# Altium PCB FT8.PcbDoc (part 1 of 2)
Units mm, origin at the board's own origin, x right, y up, seen from the top; angles counter-clockwise.
Board outline 50 x 100 mm, 4 copper layers (Top Layer, Layer 1, Layer 2, Bottom Layer), stack 1.586 mm thick; 161 components, 91 nets, 512 pads, 171 vias.
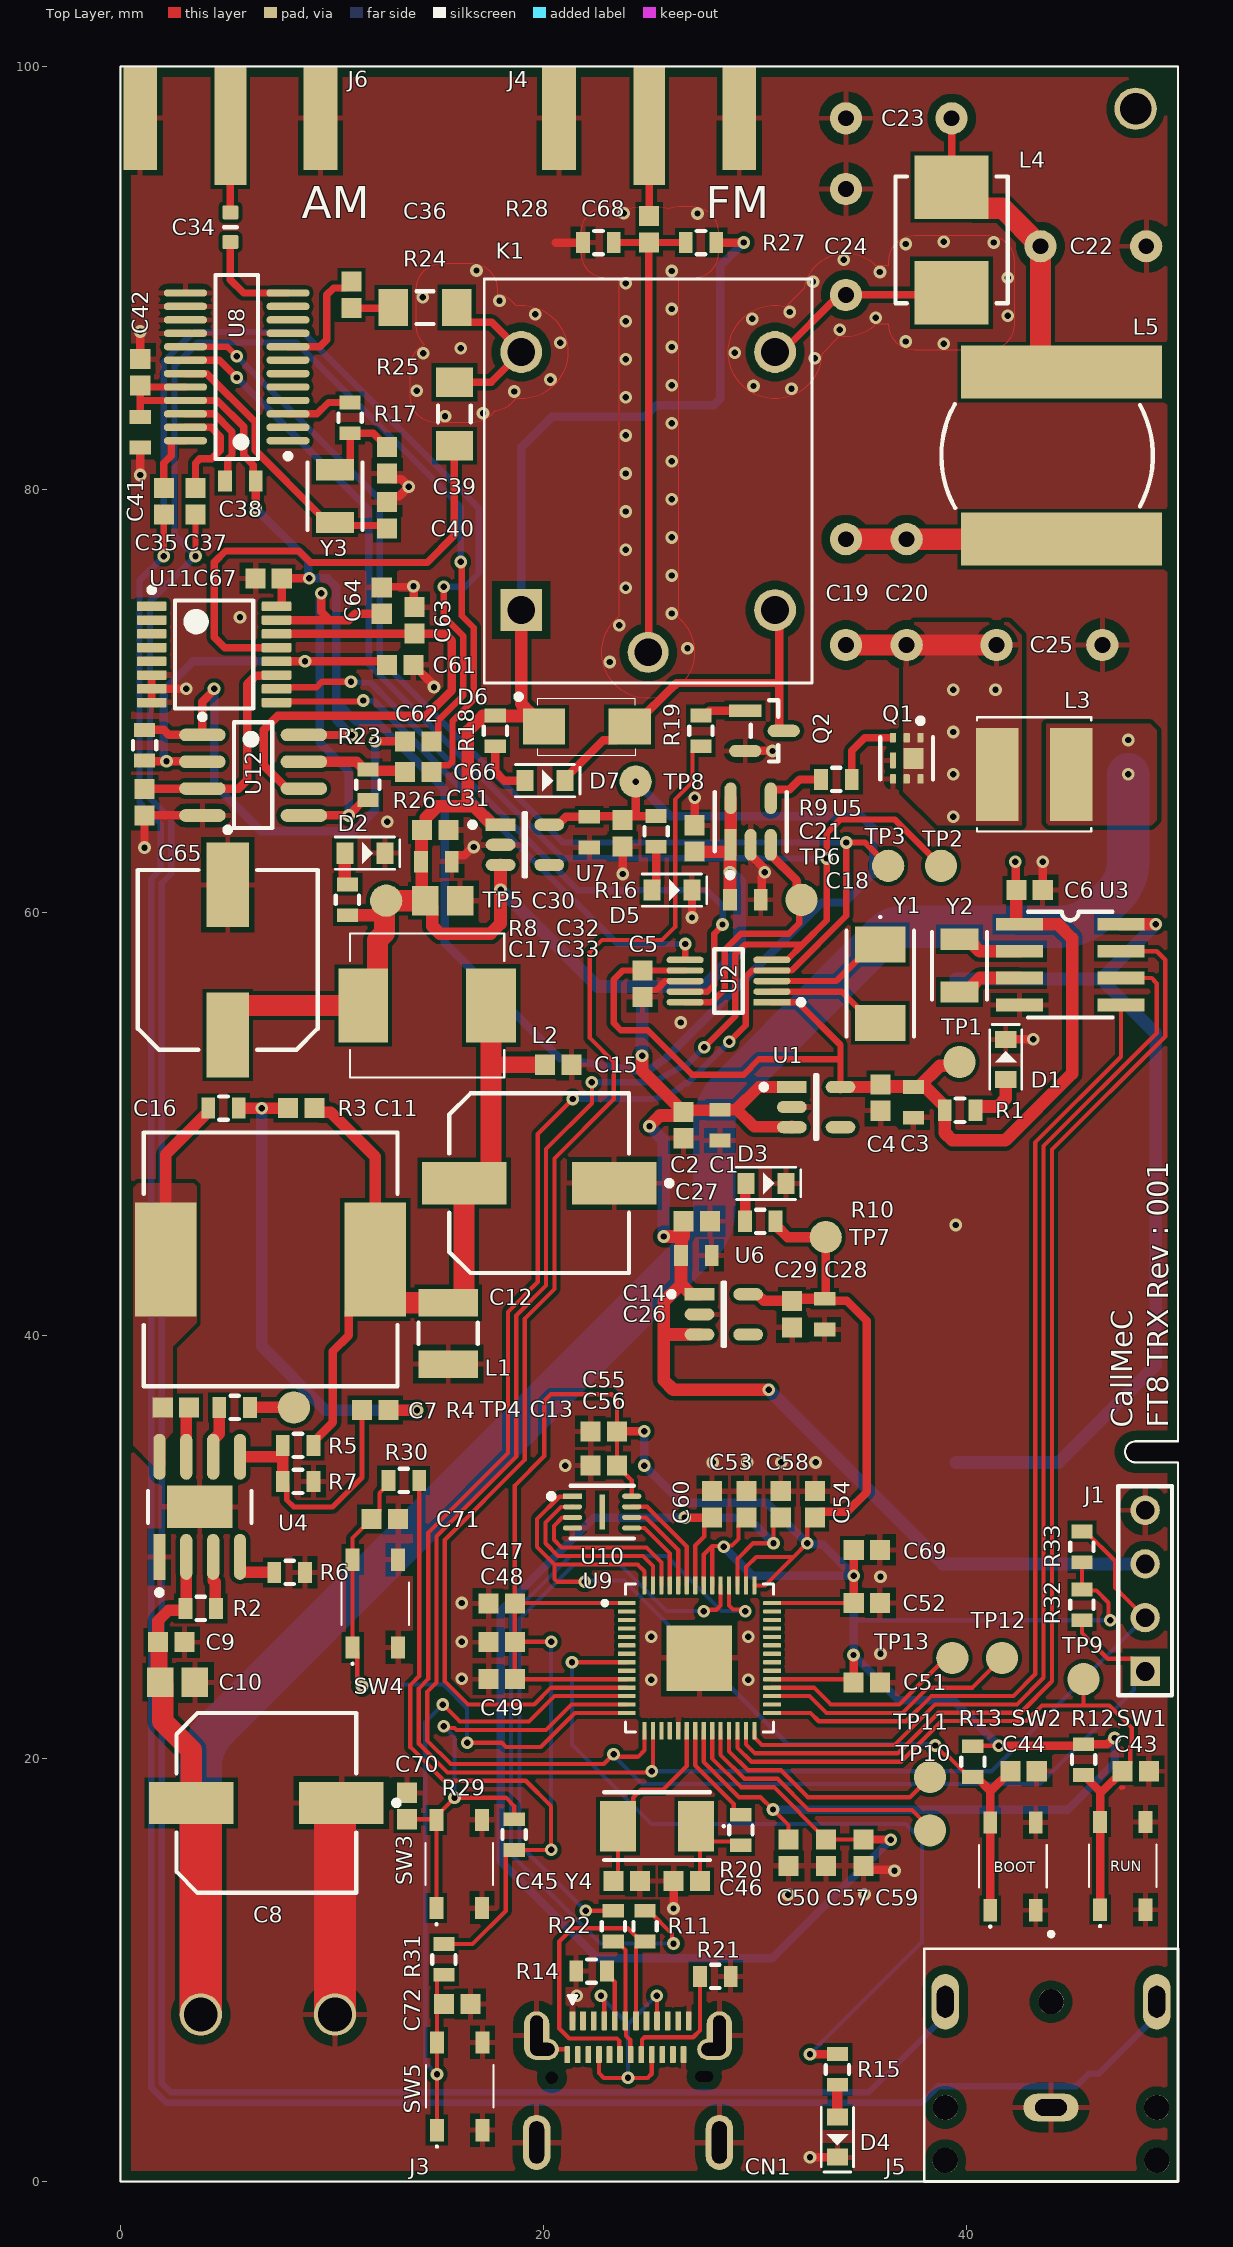
[diagram p0: Top Layer view]
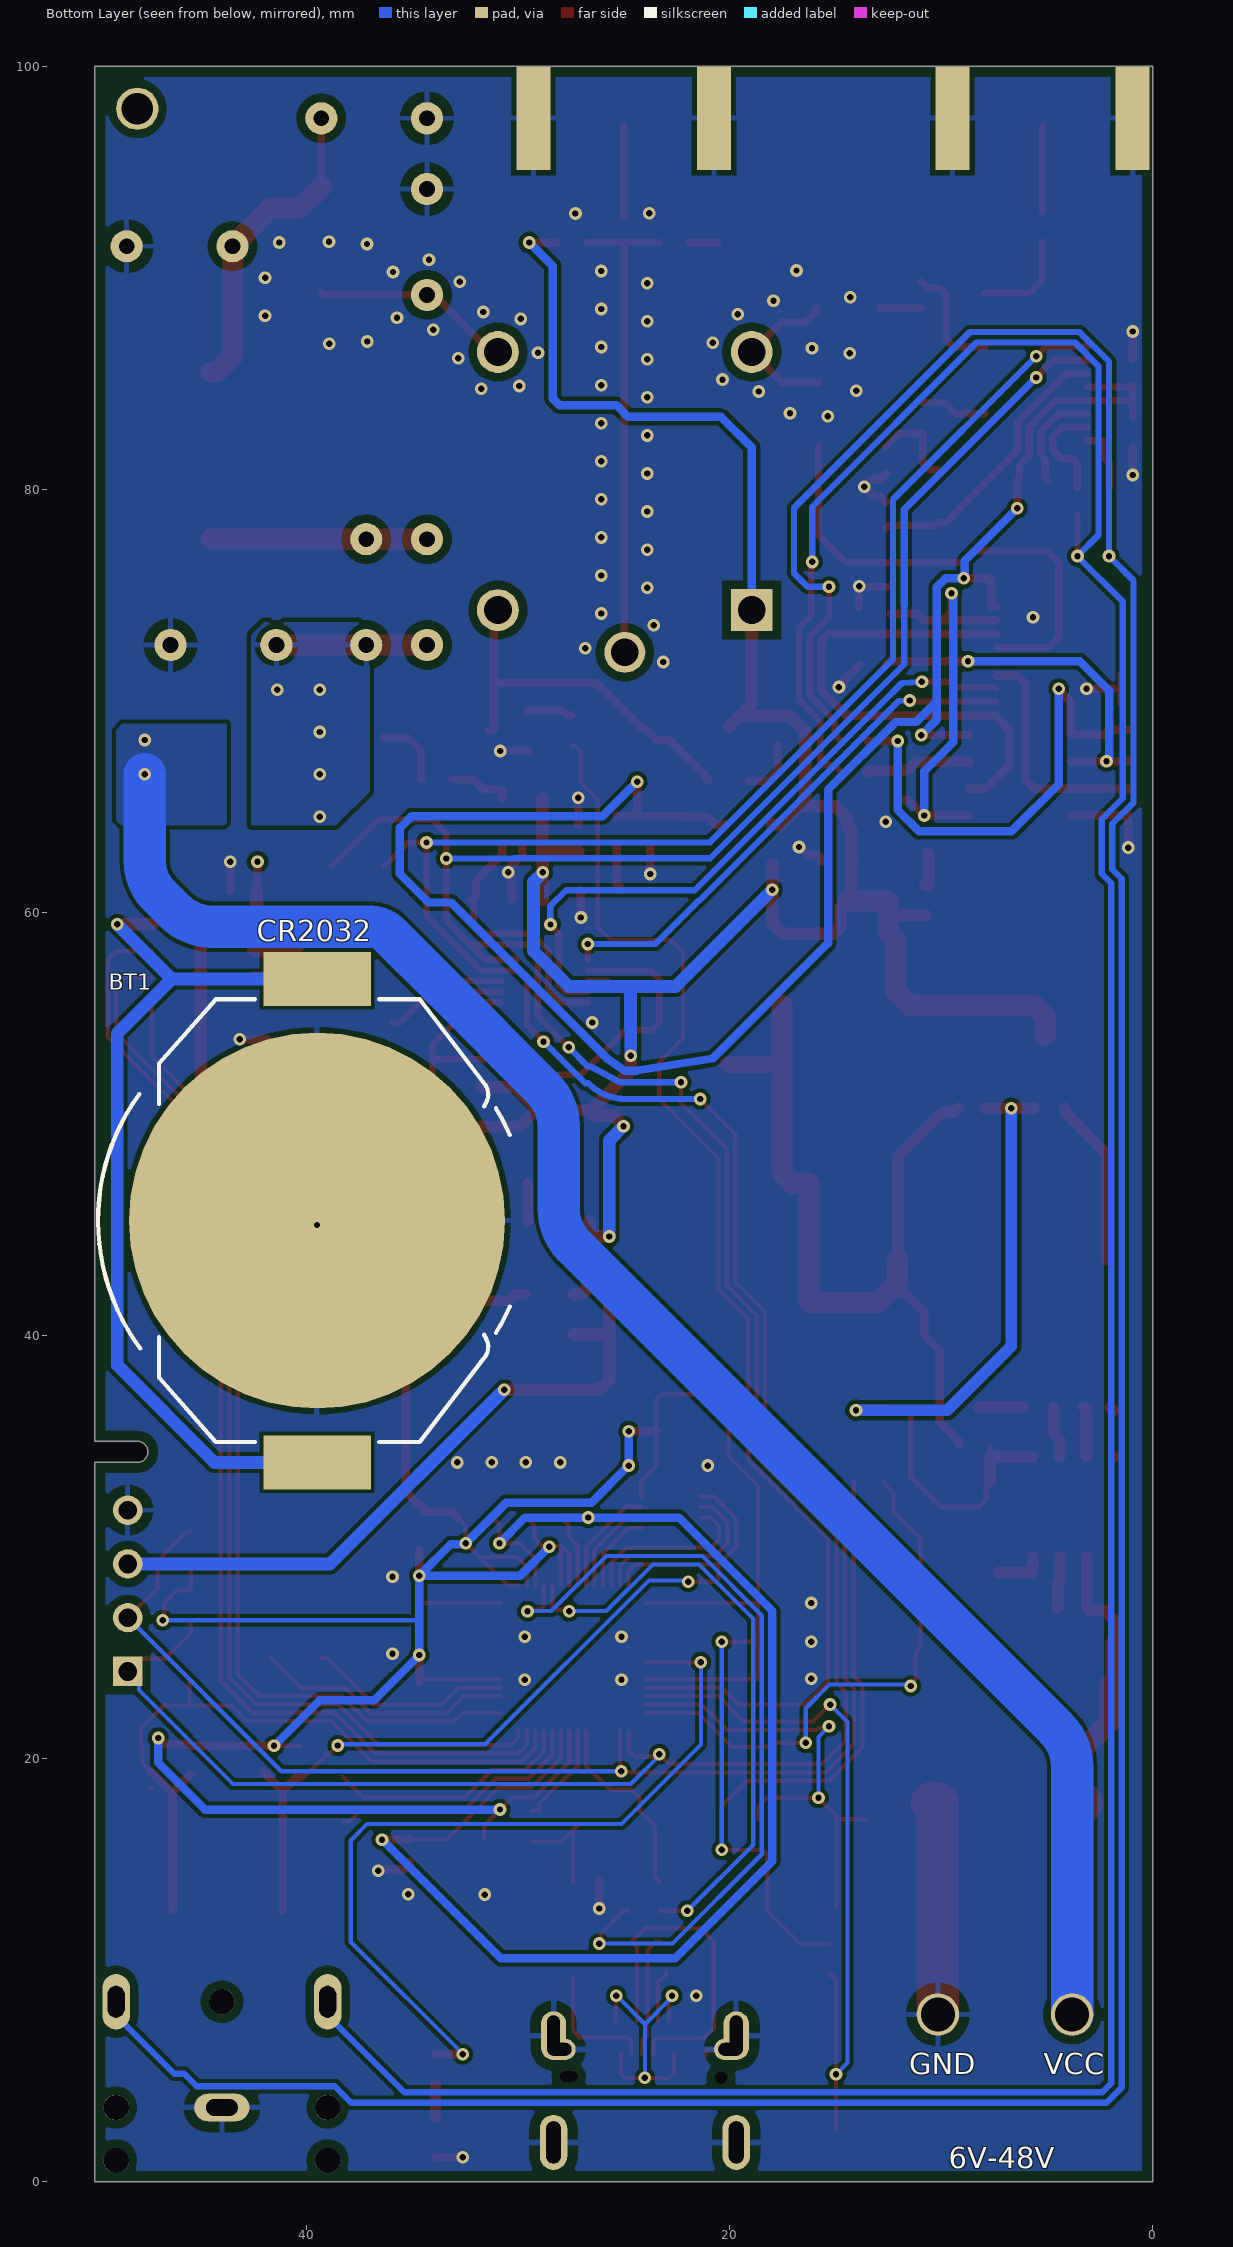
[diagram p1: Bottom Layer view, seen from below]
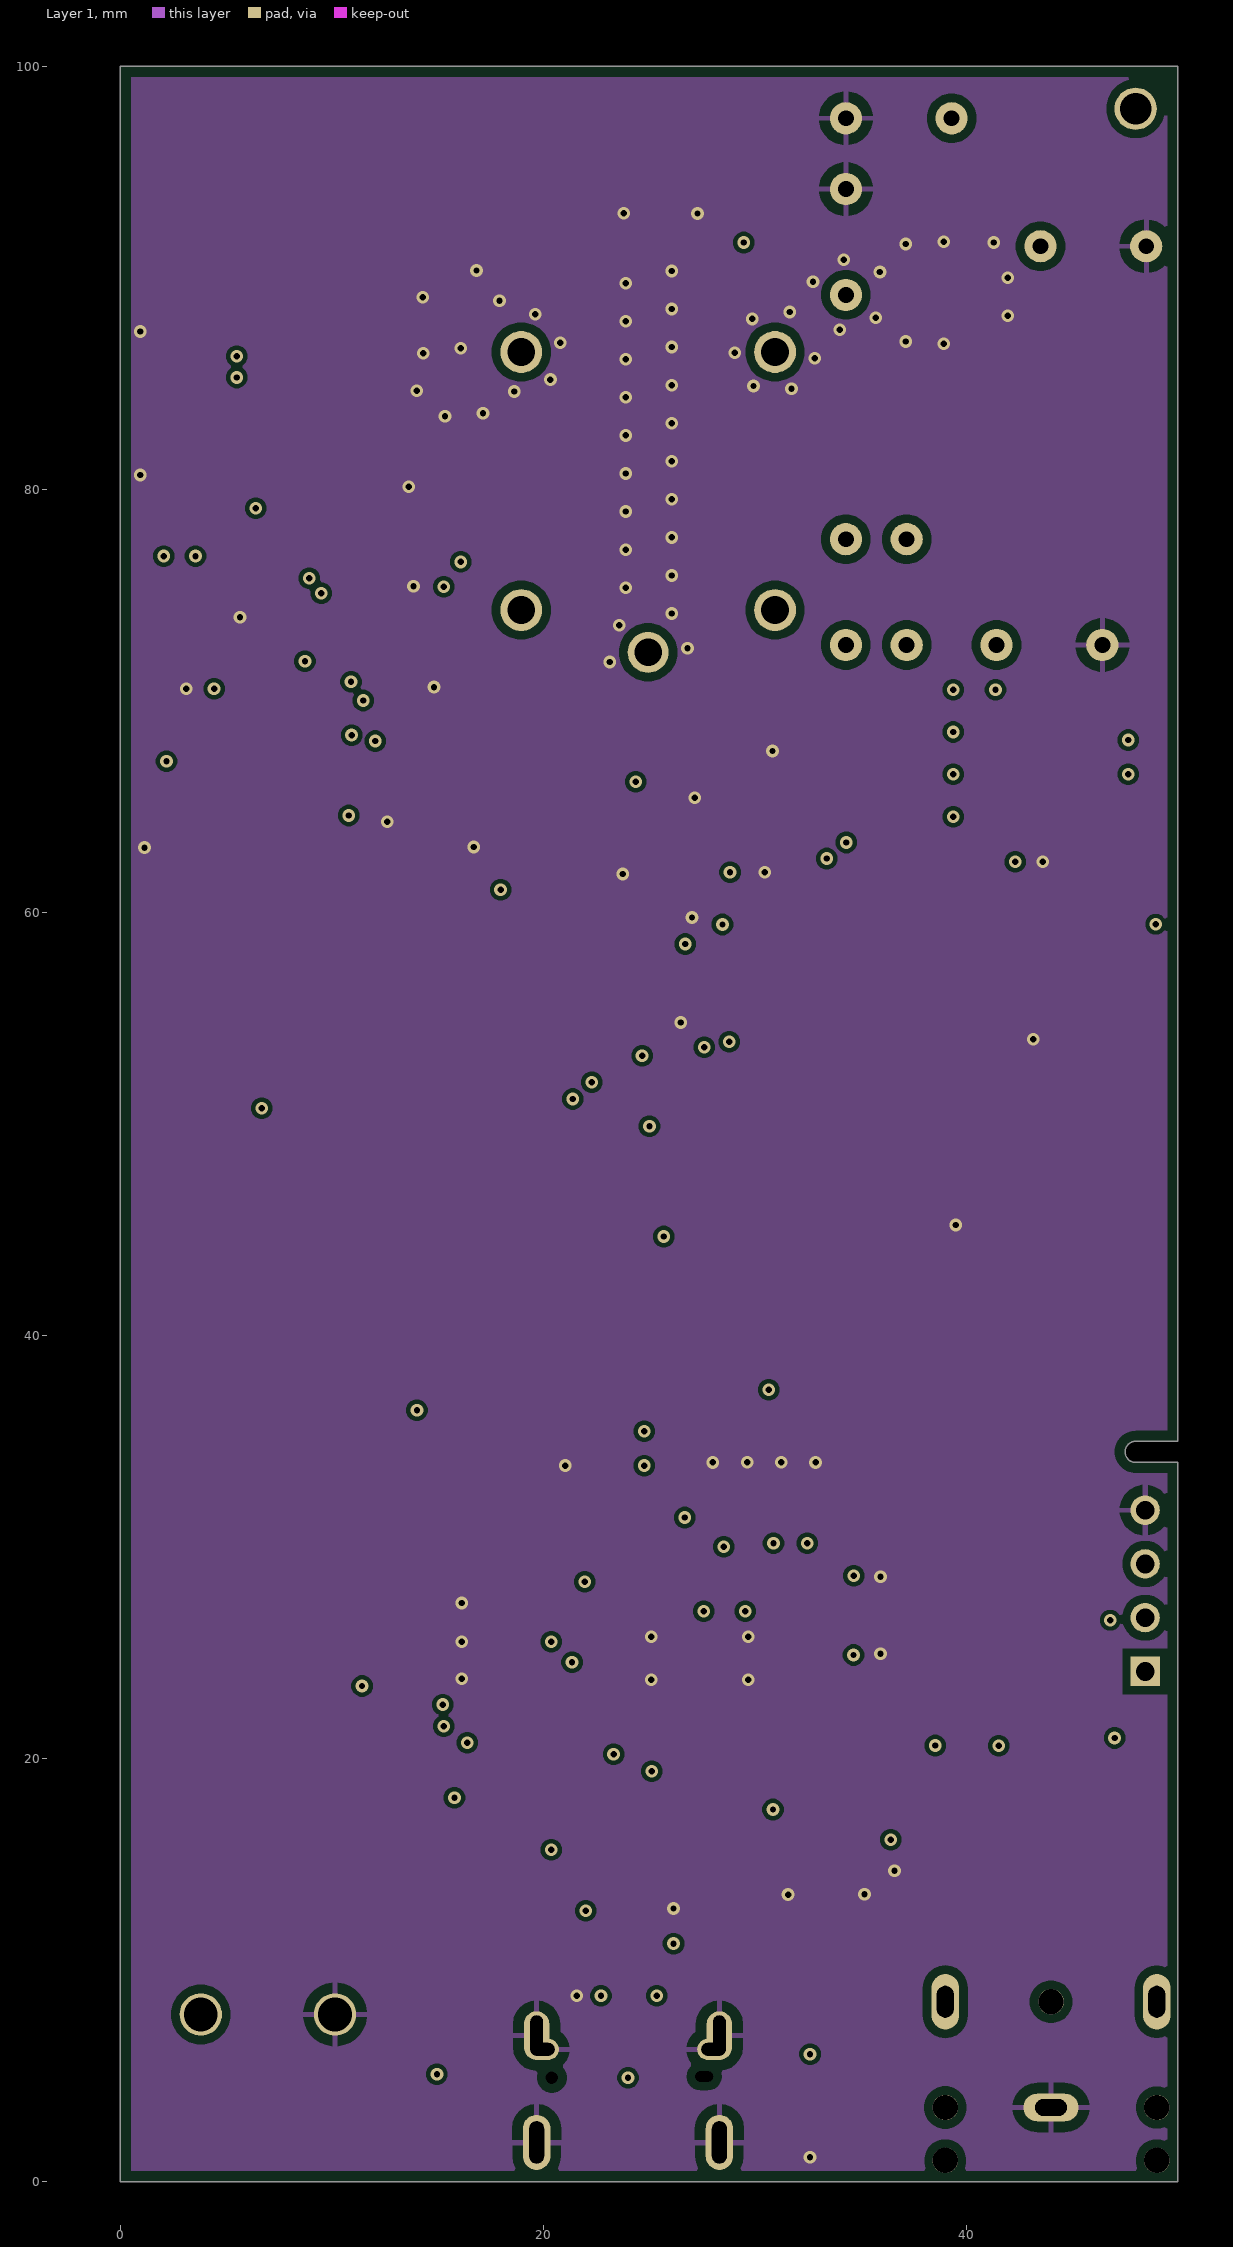
[diagram p2: Layer 1]
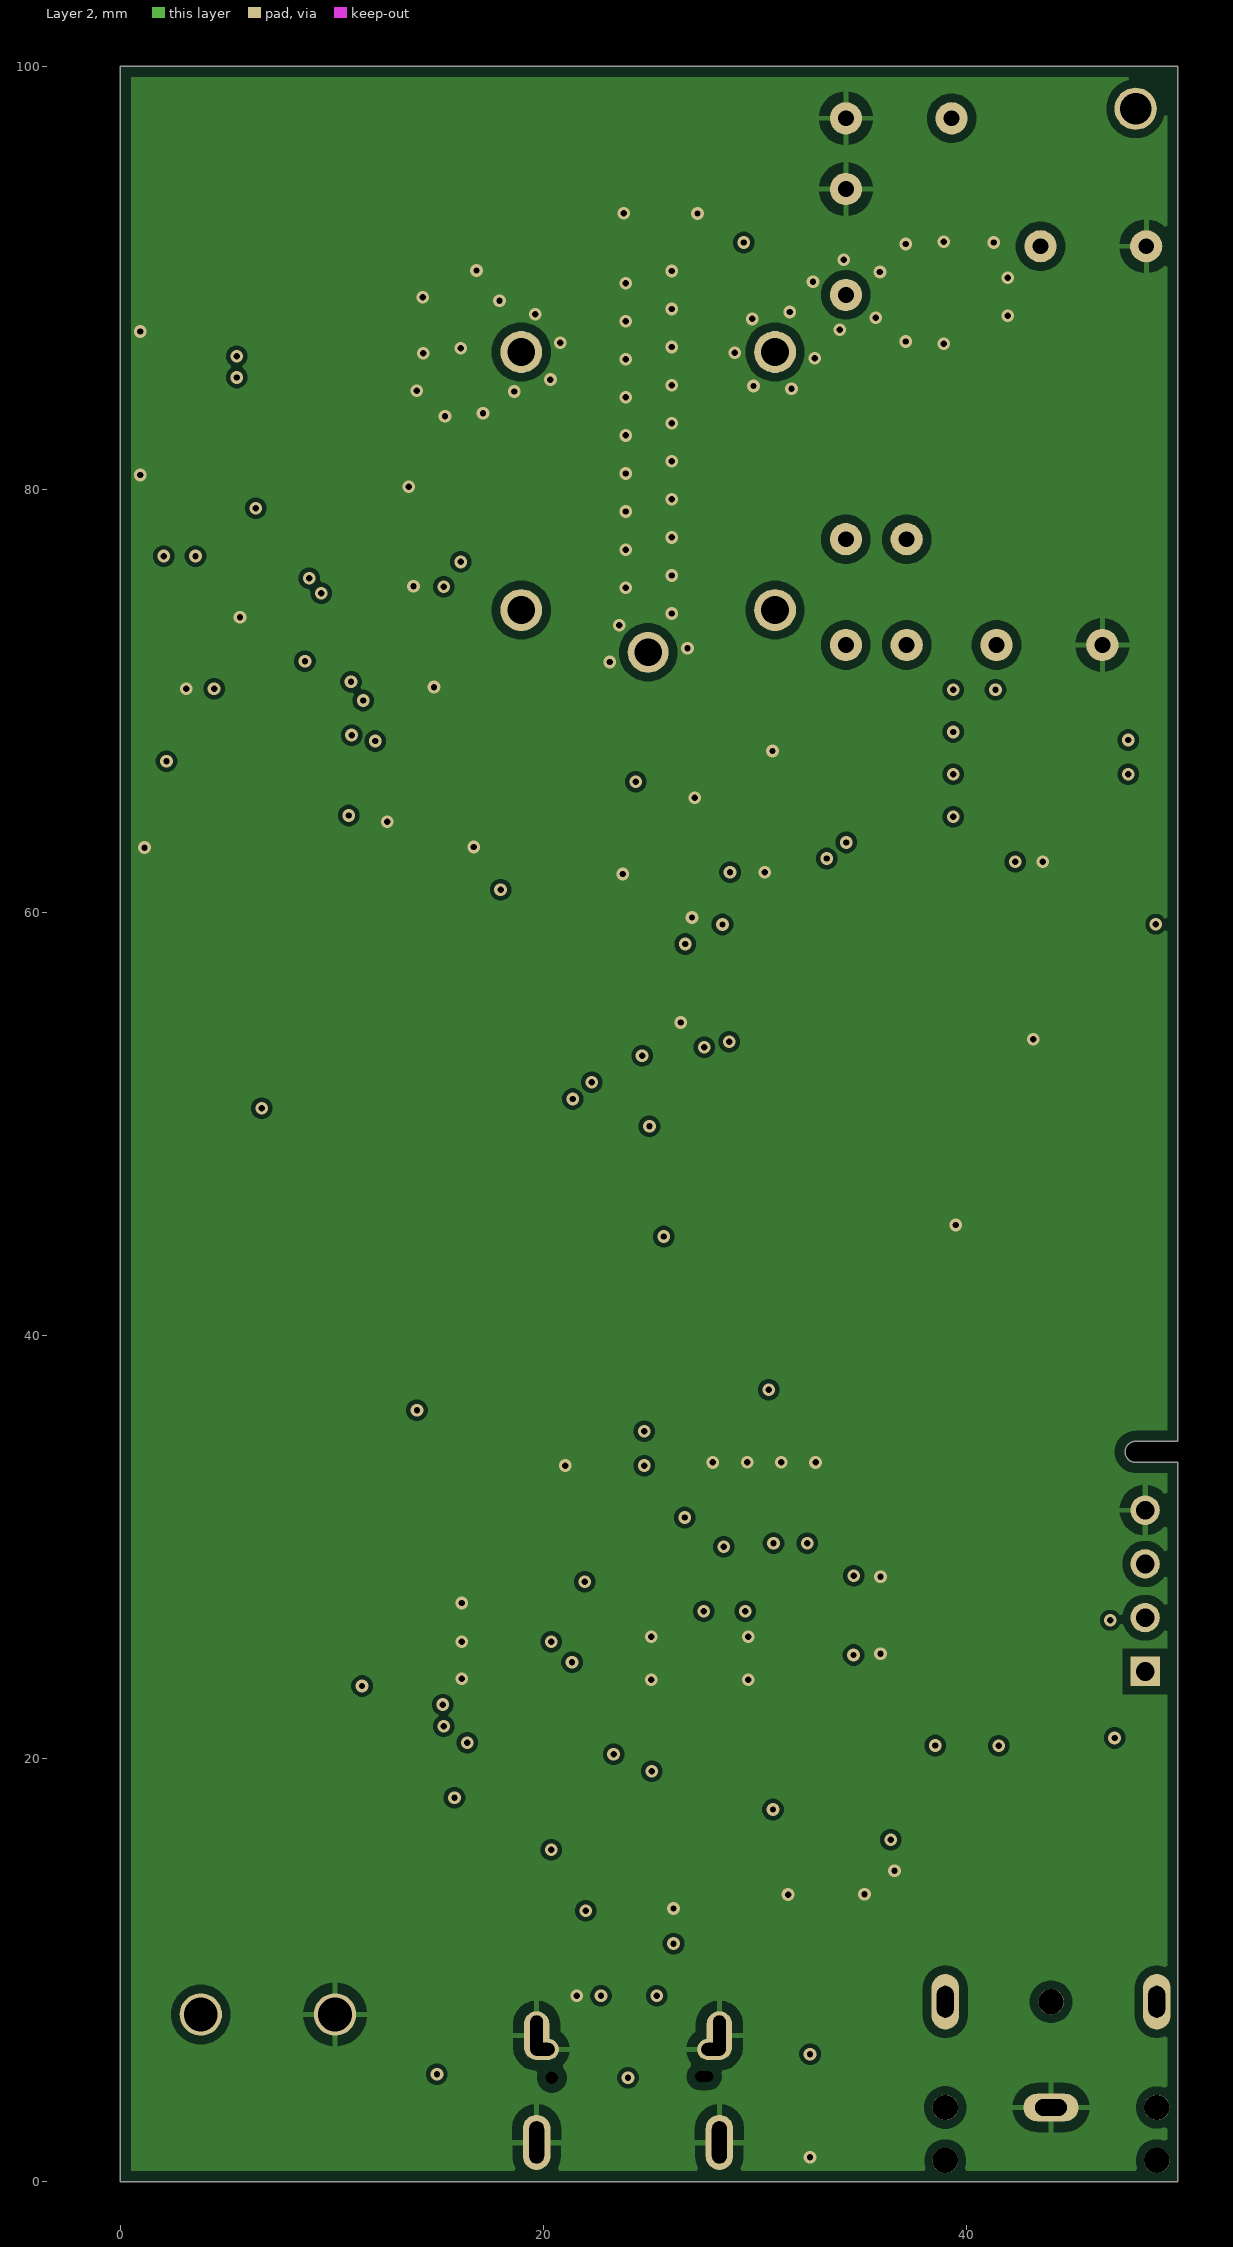
[diagram p3: Layer 2]
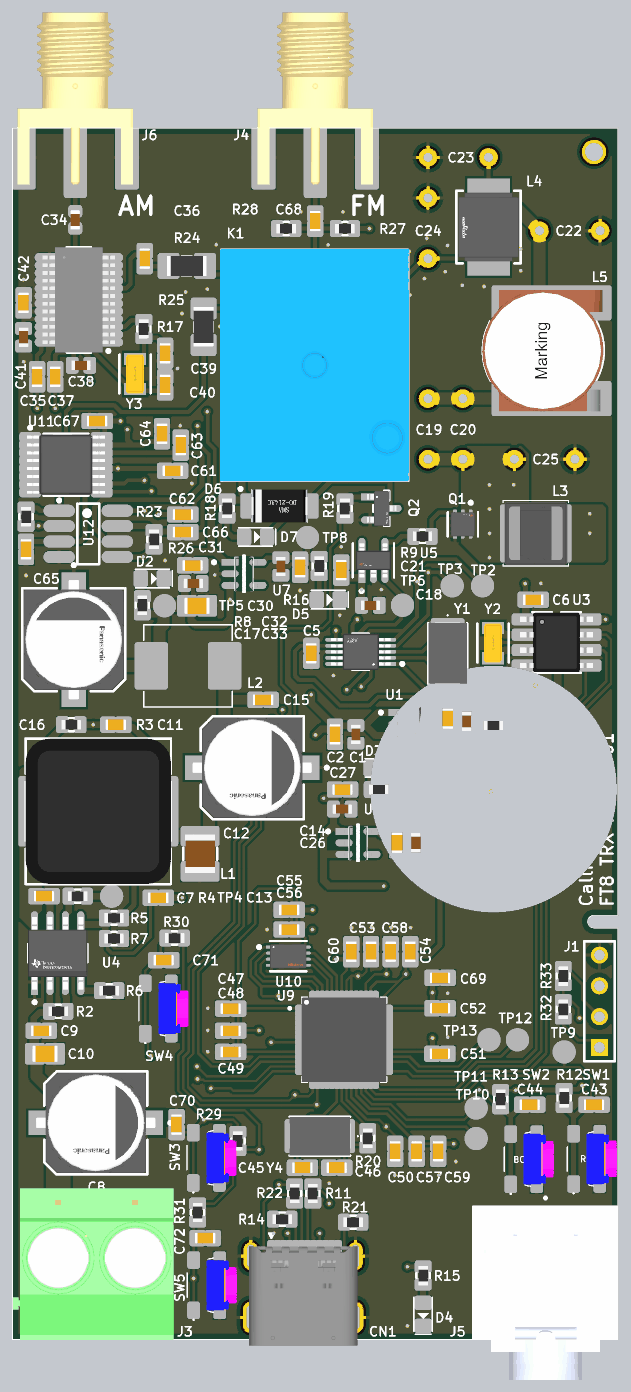
[diagram p5: 3D render of the assembled board from above, using the file's embedded part models]

## Layer stack, top to bottom
Top Solder: solder mask 0.0127, Solder Resist, Dk 3.3
Top Layer: signal copper 0.035
Dielectric 1: prepreg 0.2104, PP-006, Dk 4.4
Layer 1: signal copper 0.0152
Dielectric1: core 1.065, FR-4, Dk 4.6
Layer 2: signal copper 0.0152
Dielectric 2: prepreg 0.2104, PP-006, Dk 4.4
Bottom Layer: signal copper 0.035
Bottom Solder: solder mask 0.0127, Solder Resist, Dk 3.3

## Board outline
0,0 0,100 50,100 50,35 48,35 ccw(c48,34.5) 48,34 50,34 50,0

## Design rules (kind name [scope] priority, off if disabled: settings)
BoardOutlineClearance [All] p1: gap=0.5 ignorepadtopadclearanceinfootprint=FALSE except(0: Arc-SplitContinuation Track-SplitContinuation SMDPad-SplitContinuation THPad-SplitContinuation Via-SplitContinuation Fill-SplitContinuation Poly-SplitContinuation Region-SplitContinuation Text-SplitContinuation; 0.254: Arc-OutlineEdge Arc-CavityEdge Arc-CutoutEdge Arc-SplitBarrior Via-OutlineEdge Via-CavityEdge Via-CutoutEdge Via-SplitBarrior Text-OutlineEdge Text-CavityEdge Text-CutoutEdge Text-SplitBarrior)
Clearance [All] p1: gap=0.2 ignorepadtopadclearanceinfootprint=FALSE except(0.195: Arc-Arc Arc-Track Arc-SMDPad Arc-Fill Arc-Poly Arc-Region Track-Track Track-SMDPad Track-Fill Track-Poly Track-Region SMDPad-SMDPad SMDPad-Fill SMDPad-Poly SMDPad-Region; 0.4: THPad-Fill THPad-Poly THPad-Region)
ComponentClearance [All] p1: gap=0.2 collisioncheckmode=3 verticalgap=0.2 showdistances=FALSE
DiffPairsRouting [All] p1: maxlimit=1 minlimit=0.2 mostfreqgap=0.254 toplayer_minwidth=0.2 toplayer_maxwidth=1 toplayer_prefwidth=0.254 midlayer1_minwidth=0.2 midlayer1_maxwidth=1 midlayer1_prefwidth=0.254 midlayer2_minwidth=0.2 midlayer2_maxwidth=1 midlayer2_prefwidth=0.254 bottomlayer_minwidth=0.2 bottomlayer_maxwidth=1 bottomlayer_prefwidth=0.254 maxuncoupledlength=12.7
HoleSize [All] p1: absolutevalues=TRUE maxlimit=7.62 minlimit=0.2 maxpercent=80.000 minpercent=20.000
HoleToHoleClearance [All] p1: gap=0.2 allowstackedmicrovias=TRUE
MinimumAnnularRing [All] p1: minimumring=0.15
MinimumSolderMaskSliver [All] p1: minsoldermaskwidth=0.05
PasteMaskExpansion [All] p1: expansion=0.2
PlaneClearance [All] p1: clearance=0.381
PlaneConnect [All] p1: pad.planeconnectstyle=Relief pad.reliefexpansion=0.508 pad.reliefentries=4 pad.reliefconductorwidth=0.254 pad.reliefairgap=0.254 via.planeconnectstyle=Direct via.reliefexpansion=0.508 via.reliefentries=4 via.reliefconductorwidth=0.254 via.reliefairgap=0.254
PlaneConnect SMT_DC [IsNamedPolygon('E_AMP_DC')] p2: planeconnectstyle=Direct reliefexpansion=0.508 reliefentries=4 reliefconductorwidth=0.254 reliefairgap=0.254
PolygonConnect POLYGON_SMT_DC [IsNamedPolygon('E_AMP_DC')] p1: thpad.connectstyle=Relief thpad.reliefconductorwidth=0.254 thpad.reliefentries=4 thpad.polygonreliefangle="90 Angle" thpad.airgapwidth=0.254 smdpad.connectstyle=Direct smdpad.reliefconductorwidth=0.254 smdpad.reliefentries=4 smdpad.polygonreliefangle="90 Angle" smdpad.airgapwidth=0.254 via.connectstyle=Direct via.reliefconductorwidth=0.254 via.reliefentries=4 via.polygonreliefangle="90 Angle" via.airgapwidth=0.254
PolygonConnect [All] p2: thpad.connectstyle=Relief thpad.reliefconductorwidth=0.254 thpad.reliefentries=4 thpad.polygonreliefangle="90 Angle" thpad.airgapwidth=0.5 smdpad.connectstyle=Relief smdpad.reliefconductorwidth=0.254 smdpad.reliefentries=4 smdpad.polygonreliefangle="90 Angle" smdpad.airgapwidth=0.254 via.connectstyle=Direct via.reliefconductorwidth=0.254 via.reliefentries=4 via.polygonreliefangle="90 Angle" via.airgapwidth=0.254
RoomDefinition U_02-Clock [InComponentClass('U_02-Clock')] p1: confinementstyle=ConfineIn formatcopy=TRUE lockcomponents=FALSE outline -189.586,-112.446 -138.786,-112.446 -138.786,-87.046 -189.586,-87.046
RoutingVias [All] p1: holewidth=0.3 width=0.6 viastyle="Through Hole" minholewidth=0.3 minwidth=0.5 maxholewidth=0.5 maxwidth=1
SMDNeckDown [All] p1: percent=130.000
SilkToSilkClearance [All] p1: silktosilkclearance=0
SilkToSolderMaskClearance SilkscreenOverComponentPads [IsPad] p1: minsilkscreentomaskgap=0 clearancetoexposedcopper=TRUE
SolderMaskExpansion [All] p1: expansion=0.2 istentingtop=FALSE
UnRoutedNet [All] p1: checkbadconnections=TRUE
Width [All] p1: maxlimit=5 minlimit=0.2 preferedwidth=0.254 midlayer1_minwidth=0.254 midlayer1_maxwidth=0.254 midlayer2_minwidth=0.254 midlayer2_maxwidth=0.254 minimp=50.000000 maximp=50.000000 favimp=50.000000
19 further rules are at their usual default settings.

## Classes and differential pairs
component class U_07-Antena_Manager: C68 D6 D7 K1 Q2 R18 R19 R27 R28
component class U_06-Receiver: C30 C31 C32 C33 C34 C35 C36 C37 C38 C39 C40 C41 C42 C61 C62 C63 C64 C65 C66 C67 D5 J6 R16 R17 R23 R24 R25 R26 TP8 U7 U8 U11 U12 Y3
component class U_05-MCU: C26 C27 C28 C29 C43 C44 C45 C46 C47 C48 C49 C50 C51 C52 C53 C54 C55 C56 C57 C58 C59 C60 C69 C70 C71 C72 CN1 D3 D4 R10 R11 R12 R13 R14 R15 R20 R21 R22 R29 R30 R31 SW1 SW2 SW3 SW4 SW5 TP7 TP9 TP10 TP11 TP12 TP13 U6 U9 U10 Y4
component class U_04-AMP: C18 C19 C20 C21 C22 C23 C24 C25 L3 L4 L5 Q1 R9 TP6 U5
component class U_03-Power_Supplies: C7 C8 C9 C10 C11 C12 C13 C14 C15 C16 C17 D2 L1 L2 R2 R3 R4 R5 R6 R7 R8 TP4 TP5 U4
component class U_02-Clock: BT1 C1 C2 C3 C4 C5 C6 D1 R1 TP1 TP2 TP3 U1 U2 U3 Y1 Y2
component class 01-FBD: J1 J3 J4 J5 R32 R33
differential pair USB_D: +USB_D_P -USB_D_N
differential pair MCU_D: +MCU_D_P -MCU_D_N

## Components (designator, comment, footprint, x,y, rotation, side; value= is the part's Value field where it differs from the comment)
BT1 "BAT-HLD-001" BATHLD-001 39.5,45.43 r90 bottom locked
C1 "10u X5R 35V 10% 0603" C0603 28.351,49.95 r90 top locked value=10u
C2 "100 nF 10% 50 V 0603" CAPC1608X90X40NL10T20 26.628,49.95 r90 top locked value=100nF
C3 "10u X5R 35V 10% 0603" C0603 37.5,51.025 r90 top locked value=10u
C4 "100 nF 10% 50 V 0603" CAPC1608X90X40NL10T20 35.931,51.25 r90 top locked value=100nF
C5 "100 nF 10% 50 V 0603" CAPC1608X90X40NL10T20 24.678,56.634 r270 top locked value=100nF
C6 "100 nF 10% 50 V 0603" CAPC1608X90X40NL10T20 42.984,61.059 r0 top locked value=100nF
C7 "2.2nF 10% X7R 50V" CAPC1608X90X40NL10T20 2.625,36.6 r0 top locked value=2.2nF
C8 "RVT2A100M0810" FP-SF-MFG 6.9,17.9 r180 top locked
C9 "100 nF 10% 100V" CAPC1608X90X40NL10T20 2.4,25.5 r180 top locked value=100nF
C10 "1uF X7R 10% 100 V 0805" CAPC2013X95X50NL10T25 2.7,23.6 r180 top locked value=1uF
C11 "2.2nF 10% X7R 50V" CAPC1608X90X40NL10T20 8.55,50.75 r180 top locked value=2.2nF
C12 "22u X7R 25V 10% 1210" C1210 15.5,40.1 r90 top locked value=22u
C13 "68p 10% 50V" CAPC1608X90X40NL10T20 12.05,36.471 r0 top locked value=68p
C14 "RVT2A100M0810" FP-SF-MFG 19.8,47.2 r180 top locked
C15 "100 nF 10% 100V" CAPC1608X90X40NL10T20 20.7,52.8 r180 top locked value=100nF
C16 "RVT2A100M0810" FP-SF-MFG 5.075,57.759 r270 top locked
C17 "1uF X7R 10% 100 V 0805" CAPC2013X95X50NL10T25 15.242,60.559 r180 top locked value=1uF
C18 "10u X5R 35V 10% 0603" C0603 29.55,60.6 r0 top locked value=10u
C19 "FKP2O111001I00HC00" FKP2O111001I00HC00-Footprint-1 34.3,77.65 r270 top locked value="1n 1000V"
C20 "FKP2D002201D00HA00" FKP2O111001I00HC00-Footprint-1 37.175,72.65 r90 top locked value="220p 100V"
C21 "100 nF 10% 50 V 0603" CAPC1608X90X40NL10T20 27.15,63.5 r90 top locked value=100nF
C22 "FKP2F004701D00HA00" FKP2O111001I00HC00-Footprint-1 48.5,91.5 r180 top locked value="470p 100V"
C23 "FKP2D012201D00HC00" FKP2O111001I00HC00-Footprint-1 34.3,97.55 r0 top locked value="2.2n 100V"
C24 "FKP2O111001I00HC00" FKP2O111001I00HC00-Footprint-1 34.3,89.2 r90 top locked value="1n 1000V"
C25 "FKP2D002201D00HA00" FKP2O111001I00HC00-Footprint-1 46.425,72.65 r180 top value="220p 100V"
C26 "10u X5R 35V 10% 0603" C0603 27.23,43.789 r180 top locked value=10u
C27 "100 nF 10% 50 V 0603" CAPC1608X90X40NL10T20 27.25,45.4 r180 top locked value=100nF
C28 "10u X5R 35V 10% 0603" C0603 33.3,41.011 r90 top locked value=10u
C29 "100 nF 10% 50 V 0603" CAPC1608X90X40NL10T20 31.746,41.011 r90 top locked value=100nF
C30 "10u X5R 35V 10% 0603" C0603 14.942,62.397 r180 top locked value=10u
C31 "100 nF 10% 50 V 0603" CAPC1608X90X40NL10T20 14.884,63.893 r180 top locked value=100nF
C32 "10u X5R 35V 10% 0603" C0603 22.165,63.8 r90 top locked value=10u
C33 "100 nF 10% 50 V 0603" CAPC1608X90X40NL10T20 23.748,63.742 r90 top locked value=100nF
C34 "470nF 20% 25V 0603" CAPC0603(1608)100_L 5.2,92.4 r270 top locked value=470nF
C35 "4.7uF 10% 16 V 0603" CAPC1608X90X40NL10T20 2.054,79.45 r270 top locked value=4.7uF
C36 "1nF 10% 50 V 0603" CAPC1608X90X40NL10T20 10.93,89.2 r90 top locked value=1nF
C37 "4.7uF 10% 16 V 0603" CAPC1608X90X40NL10T20 3.55,79.45 r270 top locked value=4.7uF
C38 "22n X7R 100V 10% 0603" C0603 5.675,80.4 r180 top locked value=22n
C39 "22pF 10% 16V 0603" CAPC1608X90X40NL10T20 12.611,81.382 r90 top locked value=22pF
C40 "22pF 10% 16V 0603" CAPC1608X90X40NL10T20 12.611,78.782 r270 top locked value=22pF
C41 "10u X5R 35V 10% 0603" C0603 0.94,82.707 r90 top locked value=10u
C42 "100 nF 10% 50 V 0603" CAPC1608X90X40NL10T20 0.94,85.55 r270 top locked value=100nF
C43 "10 nF 10% 50 V 0603" CAPC1608X90X40NL10T20 48,19.4 r180 top locked value=10nF
C44 "10 nF 10% 50 V 0603" CAPC1608X90X40NL10T20 42.7,19.4 r180 top locked value=10nF
C45 "20 pF 5% 16V" CAPC1608X90X40NL10T20 23.943,14.201 r180 top locked value=20pF
C46 "20 pF +/- 5% 16 V 0603" CAPC1608X90X40NL10T20 26.778,14.201 r0 top locked value=20pF
C47 "4.7uF 10% 16 V 0603" CAPC1608X90X40NL10T20 18.023,27.327 r0 top locked value=4.7uF
C48 "100 nF 10% 50 V 0603" CAPC1608X90X40NL10T20 18.023,25.5 r0 top locked value=100nF
C49 "100 nF 10% 50 V 0603" CAPC1608X90X40NL10T20 18.023,23.75 r0 top locked value=100nF
C50 "100 nF 10% 50 V 0603" CAPC1608X90X40NL10T20 31.591,15.55 r90 top locked value=100nF
C51 "100 nF 10% 50 V 0603" CAPC1608X90X40NL10T20 35.287,23.6 r180 top locked value=100nF
C52 "100 nF 10% 50 V 0603" CAPC1608X90X40NL10T20 35.296,27.35 r180 top locked value=100nF
C53 "100 nF 10% 50 V 0603" CAPC1608X90X40NL10T20 29.6,32.017 r270 top locked value=100nF
C54 "100 nF 10% 50 V 0603" CAPC1608X90X40NL10T20 32.844,32.017 r270 top locked value=100nF
C55 "4.7uF 10% 16 V 0603" CAPC1608X90X40NL10T20 22.848,35.468 r0 top locked value=4.7uF
C56 "100 nF 10% 50 V 0603" CAPC1608X90X40NL10T20 22.848,33.85 r0 top locked value=100nF
C57 "4.7uF 10% 16 V 0603" CAPC1608X90X40NL10T20 33.366,15.55 r90 top locked value=4.7uF
C58 "100 nF 10% 50 V 0603" CAPC1608X90X40NL10T20 31.222,32.019 r270 top locked value=100nF
C59 "100 nF 10% 50 V 0603" CAPC1608X90X40NL10T20 35.141,15.55 r90 top locked value=100nF
C60 "100 nF 10% 50 V 0603" CAPC1608X90X40NL10T20 27.978,32.017 r270 top locked value=100nF
C61 "2.2nF 10% X7R 50V 0603" CAPC1608X90X40NL10T20 13.234,71.7 r180 top locked value=2.2nF
C62 "4.7uF 10% 16 V 0603" CAPC1608X90X40NL10T20 14.084,68.092 r0 top locked value=4.7uF
C63 "2.2nF 10% X7R 50V 0603" CAPC1608X90X40NL10T20 13.9,73.813 r270 top locked value=2.2nF
C64 "2.2nF 10% X7R 50V 0603" CAPC1608X90X40NL10T20 12.358,74.75 r270 top value=2.2nF
C65 "2.2nF 10% X7R 50V 0603" CAPC1608X90X40NL10T20 1.14,65.213 r90 top locked value=2.2nF
C66 "4.7uF 10% 16 V 0603" CAPC1608X90X40NL10T20 14.084,66.638 r0 top locked value=4.7uF
C67 "100 nF 10% 50 V 0603" CAPC1608X90X40NL10T20 7.004,75.8 r0 top locked value=100nF
C68 "1nF 10% 50 V 0603" CAPC1608X90X40NL10T20 25,92.3 r270 top locked value=1nF
C69 "4.7uF 10% 16 V 0603" CAPC1608X90X40NL10T20 35.296,29.863 r180 top locked value=4.7uF
C70 "10 nF 10% 50 V 0603" CAPC1608X90X40NL10T20 13.559,17.755 r270 top value=10nF
C71 "10 nF 10% 50 V 0603" CAPC1608X90X40NL10T20 12.5,31.325 r180 top value=10nF
C72 "10 nF 10% 50 V 0603" CAPC1608X90X40NL10T20 15.919,8.39 r180 top locked value=10nF
CN1 "DX07S024JJ3R1300" JAE-DX07S024JJ3_V 24,4.9 r0 top locked
D1 "KT-0603G" LED-0603-RED 41.859,53.05 r90 top locked
D2 "KT-0603G" LED-0603-RED 11.56,62.804 r0 top locked
D3 "KT-0603G" LED-0603-RED 30.522,47.189 r0 top locked
D4 "KT-0603G" LED-0603-RED 33.9,2.1 r270 top locked
D5 "KT-0603G" LED-0603-RED 26.075,61.059 r0 top locked
D6 "SS210" DO214AC(SMA) 22.05,68.788 r0 top locked
D7 "KT-0603G" LED-0603-RED 20.075,66.238 r0 top locked
J1 "2.54-1*4P" FP-87224-3-MFG 48.45,26.66 r90 top locked
J3 "MX635-6.35-02P-GN01-Cu-PS-A" MX635-6.35-02P-GN01-Cu-PS-A-Footprint-1 3.8,7.9 r0 top locked
J4 "BWSMA-KE-P001" TE_CONSMA020.062-G 25,100 r180 top locked
J5 "SJ1-3523N" CUI_SJ1-3523N 44,3.5 r0 top locked
J6 "BWSMA-KE-P001" TE_CONSMA020.062-G 5.2,100 r180 top locked
K1 "SRD-05VDC-SL-C" RELAY_SRD-05VDC-SL-C 24.95,80.4 r90 top locked
L1 "SMDRI127-680MT" SUMI-CDRH127_V 7.1,43.6 r90 top locked value="68uH 2.1A"
L2 "FXL0630-100-M" INDP7066X30N 14.5,55.6 r180 top locked value=10u
L3 "SRR5228A-100M" INDP5252X32N 43.2,66.533 r0 top locked value=10uH
L4 "LQH55DNR12M03L" FP-LQH55DN_03-MFG 39.3,91.8 r270 top locked value="120n 2220"
L5 "7449150146" 7449150146 44.5,81.6 r90 top locked value="146n 1212"
Q1 "CSD19538Q2" FP-DQK0006C-MFG 37.175,67.288 r270 top locked
Q2 "2N7002K" FP-318-08-IPC_B 30.45,68.588 r0 top locked
R1 "1K 1% 0.1W" R0603 39.7,50.65 r0 top locked value=1K
R2 "10K 1% 0.1W" R0603 3.8,27.1 r180 top locked value=10K
R3 "681K 1% 0.1W" R0603 4.875,50.75 r180 top locked
R4 "0R 1% 0.1W" R0603 5.4,36.6 r0 top locked value=0R
R5 "681K 1% 0.1W" R0603 8.4,34.8 r0 top locked
R6 "100K 1% 0.1W" R0603 8,28.8 r180 top locked value=100K
R7 "215K 1% 0.1W 0603" R0603 8.4,33.1 r180 top locked
R8 "1K 1% 0.1W" R0603 10.73,60.6 r90 top locked value=1K
R9 "10R 1% 0.1W 0603" R0603 33.85,66.288 r0 top locked value=10R
R10 "1K 1% 0.1W" R0603 30.25,45.4 r180 top locked value=1K
R11 "27R 1% 0.1W 0603" R0603 24.803,12.075 r270 top locked value=27R
R12 "10K 1% 0.1W 0603" R0603 45.537,19.95 r90 top locked value=10K
R13 "10K 1% 0.1W 0603" R0603 40.3,19.85 r90 top locked value=10K
R14 "5.1K 1% 0.1W 0603" R0603 22.276,9.95 r180 top locked value=5.1K
R15 "1K 1% 0.1W" R0603 33.9,5.3 r270 top locked value=1K
R16 "1K 1% 0.1W" R0603 25.327,63.838 r270 top locked value=1K
R17 "2K 1% 0.1W 0603" R0603 10.861,83.389 r270 top locked value=2K
R18 "1K 1% 0.1W" R0603 17.725,68.588 r270 top locked value=1K
R19 "100R 1% 0.1W 0603" R0603 27.45,68.588 r90 top locked value=100R
R20 "1K 1% 0.1W" R0603 29.331,16.621 r90 top locked value=1K
R21 "5.1K 1% 0.1W 0603" R0603 28.128,9.7 r180 top locked value=5.1K
R22 "27R 1% 0.1W 0603" R0603 23.303,12.075 r270 top locked value=27R
R23 "10K 1% 0.1W 0603" R0603 1.14,67.905 r270 top locked value=10K
R24 "0R 1% 1206 250 mW" RESC3116X70X50ML13T20 14.4,88.6 r180 top value=0
R25 "0R 1% 1206 250 mW" RESC3116X70X50ML13T20 15.792,83.574 r270 top locked value=0
R26 "10K 1% 0.1W 0603" R0603 11.7,66.038 r270 top locked value=10K
R27 "2K 1% 0.1W 0603" R0603 27.45,91.675 r0 top locked value=2K
R28 "2K 1% 0.1W 0603" R0603 22.6,91.675 r0 top locked value=2K
R29 "10K 1% 0.1W 0603" R0603 18.617,16.405 r270 top value=10K
R30 "10K 1% 0.1W 0603" R0603 13.4,33.147 r0 top value=10K
R31 "10K 1% 0.1W 0603" R0603 15.294,10.5 r90 top locked value=10K
R32 "10K 1% 0.1W 0603" R0603 45.46,27.265 r90 top locked value=10K
R33 "10K 1% 0.1W 0603" R0603 45.46,30.009 r270 top locked value=10K
SW1 "SKRPASE010" SKRPASE010 47.392,14.926 r90 top locked
SW2 "SKRPASE010" SKRPASE010 42.2,14.9 r90 top locked
SW3 "SKRPASE010" SKRPASE010 16.017,15.013 r90 top
SW4 "SKRPASE010" SKRPASE010 12.05,27.327 r90 top
SW5 "SKRPASE010" SKRPASE010 16.04,4.504 r90 top locked
TP1 "Touchpoint" Touchpoint-Footprint-1 39.675,52.934 r0 top locked
TP2 "Touchpoint" Touchpoint-Footprint-1 38.8,62.208 r90 top
TP3 "Touchpoint" Touchpoint-Footprint-1 36.301,62.208 r90 top
TP4 "Touchpoint" Touchpoint-Footprint-1 8.2,36.6 r90 top
TP5 "Touchpoint" Touchpoint-Footprint-1 12.566,60.559 r90 top
TP6 "Touchpoint" Touchpoint-Footprint-1 32.2,60.6 r90 top locked
TP7 "Touchpoint" Touchpoint-Footprint-1 33.348,44.65 r90 top locked
TP8 "Touchpoint" Touchpoint-Footprint-1 24.361,66.188 r90 top locked
TP9 "Touchpoint" Touchpoint-Footprint-1 45.537,23.75 r90 top locked
TP10 "Touchpoint" Touchpoint-Footprint-1 38.277,16.605 r270 top locked
TP11 "Touchpoint" Touchpoint-Footprint-1 38.277,19.125 r270 top locked
TP12 "Touchpoint" Touchpoint-Footprint-1 41.684,24.75 r90 top locked
TP13 "Touchpoint" Touchpoint-Footprint-1 39.334,24.75 r90 top locked
U1 "AP2127K-3.3TRG1" FP-SOT25-IPC_B 32.897,50.8 r0 top locked
U2 "SI5351A-B-GTR" FP-SI5351A-B-GTR-IPC_B 28.75,56.759 r180 top locked
U3 "DS1302Z" SO8 44.909,57.534 r270 top locked
U4 "LM5164DDAR" FP-DDA0008E-IPC_B 3.75,31.9 r90 top locked
U5 "UCC27519DBVT" FP-DBV0005A-IPC_B 29.8,64.3 r90 top locked
U6 "AP2127K-3.3TRG1" FP-SOT25-IPC_B 28.528,41 r0 top locked
U7 "AP2127K-3.3TRG1" FP-SOT25-IPC_B 19.125,63.2 r0 top locked
U8 "SI4735-D60-GU" SLAB-SSOP-24_N 5.5,85.797 r180 top locked
U9 "RP2040" QFN40P700X700X90-57N 27.378,24.75 r0 top
U10 "W25Q16JVUXIQ" FP-UX-IPC_B 22.776,31.65 r0 top
U11 "SN74LV4052APWR" PW0016A_N 4.429,72.2 r0 top locked
U12 "MCP6002-I/SN" SOIC-SN8_N 6.275,66.492 r0 top locked
Y1 "XG1EL89CKI-111YLC-25M" X50328MSB2GI-Footprint-1 35.925,56.634 r270 top locked value="25MHz 10pF"
Y2 "Q13FC13500049" FP-ABS07-120-MFG 39.675,57.484 r90 top locked value="32.768kHz 6pF"
Y3 "Q13FC13500049" FP-ABS07-120-MFG 10.14,79.682 r90 top locked value="32.768kHz 6pF"
Y4 "X503212MSB2GI" X50328MSB2GI-Footprint-1 25.373,16.801 r180 top locked

## Footprints (in the part's own frame and the unit in brackets; to place one, negate y for a bottom-side part, rotate by r counter-clockwise, add the part's x,y. Pads: shape width x height; smd on the part's side, far side on the other; paste and mask are expansions set on the pad)
7449150146 [mm] "Air Coil High Current Inductor, size 1010"
  rect 2.5x9.5 smd: 1(-3.95,0) 2(3.95,0)
  silkscreen extent -2.47,-4.31 2.43,5.68, body extent -5,-4.28 5,5.73, height 6.26
BATHLD-001 [mm] "LINX CR2032 BATTERY HOLDER"
  round 17.78 smd: 1(0,0)
  rect 2.54x5.08 smd: 2(-11.43,0) 2(11.43,0)
  silkscreen extent -10.47,-9.11 10.47,10.35, body extent -10.32,-9.95 10.32,10.38, height 4.3
C0603 [mm]
  rect 0.65x1 smd: 1(-0.725,0) 2(0.725,0)
  body extent -0.8,-0.4 0.8,0.4, height 0.8
C1210 [mm]
  rect 1.3x2.8 smd: 1(-1.45,0) 2(1.45,0)
  silkscreen extent -0.5,-1.4 0.5,1.4, body extent -1.6,-1.25 1.6,1.25, height 2.5
CAPC0603(1608)100_L [mm] "Chip Capacitor, Body 1.6x0.8mm, Height 1.0mm, IPC High Density"
  rrect25% 0.66x0.76 smd: 1(-0.7,0) 2(0.7,0)
  silkscreen extent 0,-0.3 0,0.3, body extent -0.8,-0.4 0.8,0.4, height 0.95
CAPC1608X90X40NL10T20 [mm] "Chip Capacitor, 2-Leads, Body 1.70x0.90mm, IPC Medium Density"
  rect 0.95x0.95 smd: 1(-0.625,0) 2(0.625,0)
  body extent -0.85,-0.45 0.85,0.45, height 0.9
CAPC2013X95X50NL10T25 [mm] "Chip Capacitor, 2-Leads, Body 2.10x1.35mm, IPC Medium Density"
  rect 1.25x1.4 smd: 1(-0.825,0) 2(0.825,0)
  body extent -1.05,-0.67 1.05,0.67, height 0.95
CUI_SJ1-3523N [mm]
  oval 2.616x1.308 hole 0.8 slot 1.5 at 0 deg: 1(0,0)
  oval 1.308x2.616 hole 0.8 slot 1.5 at 90 deg: 2(5,5) 3(-5,5)
  round 1.2 hole 1.2 unplated: ""(-5,-2.5) ""(-5,0) ""(0,5) ""(5,-2.5) ""(5,0)
  silkscreen extent -6,-3.5 6,8.3, body extent -6,-6.81 6,7.49, height 5.8
DO214AC(SMA) [mm] "Magnetic-Core Inductor with Winding Polarity Marking; 2 Leads"
  rect 2x1.7 smd: 1(2.025,0) 2(-2.025,0)
  silkscreen extent -2.31,-1.35 2.31,1.35, body extent -2.3,-1.35 2.3,1.35, height 2.4
FKP2O111001I00HC00-Footprint-1 [mil]
  round 60 hole 29.53: 1(0,0) 2(196.85,0)
FP-318-08-IPC_B [mm]
  rect 1.524x0.578 smd paste+0 mask+0: 1(-0.91,0.95)
  rrect100% 1.524x0.578 smd paste+0 mask+0: 2(-0.91,-0.95) 3(0.91,0)
  silkscreen extent -0.65,-1.45 0.65,1.45, body extent -1.92,-1.7 1.92,1.7, height 0.25
FP-87224-3-MFG [mil]
  rect 54.69x54.69 hole 35 paste-99999 mask+0: 1(-100,0)
  round 54.69 hole 35 paste-99999 mask+0: 2(0,0) 3(100,0) 4(200,0)
  silkscreen extent -145,-50 245,50
FP-ABS07-120-MFG [mm]
  rect 1x1.8 smd paste+0 mask+0: 1(-1.25,0) 2(1.25,0)
  silkscreen extent -1.6,-1.3 1.6,1.3, body extent -1.85,-1 1.85,1, height 0.25
FP-DBV0005A-IPC_B [mm]
  rect 1.505x0.572 smd paste+0 mask+0: 1(-1.1,0.95)
  rrect100% 1.505x0.572 smd paste+0 mask+0: 2(-1.1,0) 3(-1.1,-0.95) 4(1.1,-0.95) 5(1.1,0.95)
  silkscreen extent -2.65,-1.7 1.4,1.7, body extent -2.1,-1.7 2.1,1.7, height 0.25
FP-DDA0008E-IPC_B [mm]
  rect 2.174x0.582 smd paste+0 mask+0: 1(-2.366,1.905)
  rrect100% 2.174x0.582 smd paste+0 mask+0: 2(-2.366,0.635) 3(-2.366,-0.635) 4(-2.366,-1.905) 5(2.366,-1.905) 6(2.366,-0.635) 7(2.366,0.635) 8(2.366,1.905)
  rect 2.025x3.1 smd paste-1000 mask+0: 9(0,0)
  silkscreen extent -4.17,-2.45 0.75,2.45, body extent -3.7,-2.7 3.7,2.7, height 0.25
FP-DQK0006C-MFG [mm]
  rrect33% 0.45x0.3 smd paste+0 mask+0: 1(-0.975,0.65) 2(-0.975,0) 3(-0.975,-0.65) 4(0.975,-0.65) 5(0.975,0) 6(0.975,0.65)
  rrect33% 0.75x0.3 smd paste-1000 mask+0: 7(0.095,-0.65)
  rrect11% 1x0.95 smd paste-1000 mask+0: 8(0,0.325)
  silkscreen extent -1.9,-1.25 1,1.25, body extent -1.3,-1.15 1.3,1.15, height 0.25
FP-LQH55DN_03-MFG [mm]
  rect 3x3.5 smd paste+0 mask+0: 1(-2.5,0) 2(2.5,0)
  silkscreen extent -3,-2.65 3,2.65, body extent -4.1,-2.75 4.1,2.75, height 0.25
FP-SF-MFG [mm]
  rect 4x2 smd paste+0 mask+0: 1(-3.55,0) 2(3.55,0)
  silkscreen extent -6.28,-4.25 4.25,4.25, body extent -5.8,-4.5 5.8,4.5, height 0.25
FP-SI5351A-B-GTR-IPC_B [mm]
  rect 1.754x0.305 smd paste+0 mask+0: 1(-2.05,1)
  rrect100% 1.754x0.305 smd paste+0 mask+0: 2(-2.05,0.5) 3(-2.05,0) 4(-2.05,-0.5) 5(-2.05,-1) 6(2.05,-1) 7(2.05,-0.5) 8(2.05,0) 9(2.05,0.5) 10(2.05,1)
  silkscreen extent -3.55,-1.5 0.67,1.5, body extent -3.18,-1.75 3.18,1.75, height 0.25
FP-SOT25-IPC_B [mm]
  rect 1.407x0.576 smd paste+0 mask+0: 1(-1.151,0.95)
  rrect100% 1.407x0.576 smd paste+0 mask+0: 2(-1.151,0) 3(-1.151,-0.95) 4(1.151,-0.95) 5(1.151,0.95)
  silkscreen extent -2.6,-1.5 0.05,1.5, body extent -2.1,-1.75 2.1,1.75, height 0.25
FP-UX-IPC_B [mm]
  rect 0.911x0.242 smd paste+0 mask+0: 1(-1.401,0.75)
  rrect100% 0.911x0.242 smd paste+0 mask+0: 2(-1.401,0.25) 3(-1.401,-0.25) 4(-1.401,-0.75) 5(1.401,-0.75) 6(1.401,-0.25) 7(1.401,0.25) 8(1.401,0.75)
  rect 0.25x1.65 smd paste-1000 mask+0: 9(0,0)
  silkscreen extent -2.53,-1.25 1.5,1.25, body extent -2.11,-1.25 2.11,1.25, height 0.25
INDP5252X32N [mm] "Precision Wire Wound Inductor, 2-Leads, Body 5,20x5,20mm, IPC Medium Density"
  rect 2x4.4 smd: 1(-1.75,0) 2(1.75,0)
  silkscreen extent -2.7,-2.7 2.7,2.7, body extent -2.6,-2.6 2.6,2.6, height 3.2
INDP7066X30N [mm] "Precision Wire Wound Inductor, 2-Leads, Body 7,00x6,60mm, IPC Medium Density"
  rect 2.35x3.5 smd: 1(-3.025,0) 2(3.025,0)
  silkscreen extent -3.65,-3.4 3.65,3.4, body extent -3.65,-3.4 3.65,3.4, height 3
JAE-DX07S024JJ3_V [mm] "THD, 24-Leads, Body 8.17x8.94mm, Pitch 0.5mm"
  oval 1.2x2.3 hole 0.6 slot 1.9 at 90 deg: 1(-4.32,2) 2(4.32,2)
  oval 1.5x1 hole 0.6 slot 1.1 at 0 deg: 1(-4.02,1.35) 2(4.02,1.35)
  oval 1.3x2.6 hole 0.7 slot 2 at 90 deg: 3(-4.32,-3.05) 4(4.32,-3.05)
  rrect25% 0.27x0.9 smd: A1(-2.625,2.7) A2(-2.125,2.7) A3(-1.625,2.7) A4(-1.125,2.7) A5(-0.625,2.7) A6(-0.125,2.7) A7(0.375,2.7) A8(0.875,2.7) A9(1.375,2.7) A10(1.875,2.7) A11(2.375,2.7) A12(2.875,2.7)
  rrect25% 0.27x0.8 smd: B1(2.625,1.1) B2(2.125,1.1) B3(1.625,1.1) B4(1.125,1.1) B5(0.625,1.1) B6(0.125,1.1) B7(-0.375,1.1) B8(-0.875,1.1) B9(-1.375,1.1) B10(-1.875,1.1) B11(-2.375,1.1) B12(-2.875,1.1)
  round 0 hole 0.6 unplated: H1(-3.6,0)
  round 0 hole 0.5 slot 0.85 at 0 deg unplated: H2(3.6,0.065)
  silkscreen extent -2.83,3.49 -2.43,3.89, body extent -4.47,-5.35 4.47,2.8, height 3.16
LED-0603-RED [mm]
  rect 0.8x1 smd: 1(-0.95,0) 2(0.95,0)
  silkscreen extent -1.4,-0.76 1.65,0.76, body extent -0.8,-0.4 0.8,0.4, height 0.6
MX635-6.35-02P-GN01-Cu-PS-A-Footprint-1 [mm]
  round 2 hole 1.6: 1(0,0) 2(6.35,0)
  body extent -3.77,-7.9 9.53,4.6, height 20.75
PW0016A_N [mm] "SOP, 16-Leads, Body 5.1x4.5mm, Pitch 0.65mm, IPC Medium Density"
  rrect22% 1.4x0.45 smd: 1(-2.95,2.275) 2(-2.95,1.625) 3(-2.95,0.975) 4(-2.95,0.325) 5(-2.95,-0.325) 6(-2.95,-0.975) 7(-2.95,-1.625) 8(-2.95,-2.275) 9(2.95,-2.275) 10(2.95,-1.625) 11(2.95,-0.975) 12(2.95,-0.325) 13(2.95,0.325) 14(2.95,0.975) 15(2.95,1.625) 16(2.95,2.275)
  silkscreen extent -3.07,-2.55 1.85,3.17, body extent -3.21,-2.5 3.21,2.5, height 1
QFN40P700X700X90-57N [mm]
  rrect25% 0.84x0.2 smd: 1(-3.435,2.6) 2(-3.435,2.2) 3(-3.435,1.8) 4(-3.435,1.4) 5(-3.435,1) 6(-3.435,0.6) 7(-3.435,0.2) 8(-3.435,-0.2) 9(-3.435,-0.6) 10(-3.435,-1) 11(-3.435,-1.4) 12(-3.435,-1.8) 13(-3.435,-2.2) 14(-3.435,-2.6) 29(3.435,-2.6) 30(3.435,-2.2) 31(3.435,-1.8) 32(3.435,-1.4) 33(3.435,-1) 34(3.435,-0.6) 35(3.435,-0.2) 36(3.435,0.2) 37(3.435,0.6) 38(3.435,1) 39(3.435,1.4) 40(3.435,1.8) 41(3.435,2.2) 42(3.435,2.6)
  rrect25% 0.2x0.84 smd: 15(-2.6,-3.435) 16(-2.2,-3.435) 17(-1.8,-3.435) 18(-1.4,-3.435) 19(-1,-3.435) 20(-0.6,-3.435) 21(-0.2,-3.435) 22(0.2,-3.435) 23(0.6,-3.435) 24(1,-3.435) 25(1.4,-3.435) 26(1.8,-3.435) 27(2.2,-3.435) 28(2.6,-3.435) 43(2.6,3.435) 44(2.2,3.435) 45(1.8,3.435) 46(1.4,3.435) 47(1,3.435) 48(0.6,3.435) 49(0.2,3.435) 50(-0.2,3.435) 51(-0.6,3.435) 52(-1,3.435) 53(-1.4,3.435) 54(-1.8,3.435) 55(-2.2,3.435) 56(-2.6,3.435)
  rect 3.1x3.1 smd paste-0.57: 57(0,0)
  silkscreen extent -4.57,-3.5 3.5,3.5, body extent -3.5,-3.5 3.5,3.5, height 0.9
R0603 [mm]
  rect 0.65x1 smd: 1(-0.725,0) 2(0.725,0)
  silkscreen extent -0.2,-0.55 0.2,0.55, body extent -0.8,-0.4 0.8,0.4, height 0.45
RELAY_SRD-05VDC-SL-C [mm]
  rect 1.98x1.98 / inner round 1.98 / far side rect 1.98x1.98 hole 1.32: A1(-6.1,6)
  round 1.98 hole 1.32: A2(-6.1,-6) NC(6.1,6) NO(6.1,-6)
  round 1.935 hole 1.29: COM(-8.1,0)
  silkscreen extent -10.3,-7.75 9.55,7.75, body extent -9.6,-7.8 9.6,7.8, height 15.8
RESC3116X70X50ML13T20 [mm] "Chip Resistor, 2-Leads, Body 3.25x1.65mm, IPC Low Density"
  rect 1.4x1.75 smd: 1(-1.5,0) 2(1.5,0)
  silkscreen extent -0.4,-0.77 0.4,0.77, body extent -1.63,-0.82 1.63,0.82, height 0.7
SKRPASE010 [mm]
  rect 1.05x0.65 smd: 1(-2.075,1.075) 2(2.075,1.075) 3(-2.075,-1.075) 4(2.075,-1.075)
  silkscreen extent -2.9,-1.6 1,1.6, body extent -2.3,-1.6 2.3,1.6, height 2.5
SLAB-SSOP-24_N [mm] "SOP, 24-Leads, Body 8.7x3.9mm, Pitch 0.635mm, IPC Medium Density"
  oval 2.05x0.35 smd: 1(-2.425,3.492) 2(-2.425,2.857) 3(-2.425,2.222) 4(-2.425,1.587) 5(-2.425,0.952) 6(-2.425,0.317) 7(-2.425,-0.318) 8(-2.425,-0.953) 9(-2.425,-1.588) 10(-2.425,-2.223) 11(-2.425,-2.858) 12(-2.425,-3.492) 13(2.425,-3.492) 14(2.425,-2.857) 15(2.425,-2.222) 16(2.425,-1.587) 17(2.425,-0.952) 18(2.425,-0.317) 19(2.425,0.318) 20(2.425,0.953) 21(2.425,1.588) 22(2.425,2.223) 23(2.425,2.858) 24(2.425,3.492)
  silkscreen extent -2.55,-4.35 1,4.35, body extent -3,-4.33 3,4.33, height 2.01
SO8 [mm]
  rect 0.6x2.2 smd: 1(-1.905,-2.4) 2(-0.635,-2.4) 3(0.635,-2.4) 4(1.905,-2.4) 5(1.905,2.4) 6(0.635,2.4) 7(-0.635,2.4) 8(-1.905,2.4)
  silkscreen extent -2.5,-2 2.5,2, body extent -2.45,-3 2.45,3, height 1.7
SOIC-SN8_N [mm] "SOIC, 8-Leads, Body 4.9x3.9mm, Pitch 1.27mm, IPC Medium Density"
  oval 2.2x0.6 smd: 1(-2.4,1.905) 2(-2.4,0.635) 3(-2.4,-0.635) 4(-2.4,-1.905) 5(2.4,-1.905) 6(2.4,-0.635) 7(2.4,0.635) 8(2.4,1.905)
  silkscreen extent -2.52,-2.5 0.9,2.88, body extent -2,-2.5 2,2.5, height 1.75
SUMI-CDRH127_V [mm] "SMD, 2-Leads, Body 12x12mm"
  rect 5.4x2.9 smd: 1(0,4.95) 2(0,-4.95)
  silkscreen extent -6,-6 6,6, body extent -6,-6.1 6,6.1, height 8.4
TE_CONSMA020.062-G [mm]
  rect 1.5x5.6 smd: 1(0,2.8)
  rect 1.6x4.9 smd: G(-4.26,2.45) G(4.26,2.45)
  rect 1.6x4.9 smd far side: G(-4.26,2.45) G(4.26,2.45)
  body extent -4.76,-9.5 4.76,4.7, height 4.35
Touchpoint-Footprint-1 [mil]
  round 60 smd: 0(0,0)
X50328MSB2GI-Footprint-1 [mm]
  rect 1.7x2.4 smd: 1(-1.85,0) 2(1.85,0)
  silkscreen extent -3.2,-1.6 2.5,1.6, body extent -2.53,-1.6 2.53,1.6, height 1.45

## Part data
BT1: library part CMP-002-00120-1, "CR2032 Phosphor Bronze / Nickel Plated 20 mm Cell Size Battery Holder", LCSC_Part_#=C7501066, MFR="TE Connectivity", LCSC_Price_1ku=0.4659, MFR_Part_#=BAT-HLD-001
C1 C3 C18 C26 C28 C30 C32 C41: library part CMP-001-00153-3, "MLCC 10u X5R 35V 10% 0603", Dielectric=X7R, LCSC_Part_#=C194427, Manufacturer=Generic, MFR_Part_#=GRM188R6YA106MA73D, Tolerance=10%, Voltage=35V, Component Type=Standard, Design Item ID="10u X5R 35V 10% 0603", LCSC_Price_1ku=0.0213, PartNumber="10u X5R 35V 10% 0603", Pin Count=2, Source=GT_WH_Control.SCHLIB, Status=Preferred
C2 C4 C5 C6 C21 C27 C29 C31 C33 C42 C48 C49 C50 C51 C52 C53 C54 C56 C58 C59 C60 C67: library part CMP-001-00017-8, "Chip Capacitor, 100 nF, +/- 10%, 50 V, 0603 (1608 Metric)", Capacitor Type=Ceramic, Case/Package=0603, LCSC_Part_#=C14663, Max Operating Temperature=125°C, MFR_Part_#=CC0603KRX7R9BB104, Min Operating Temperature=-55°C, Tolerance=10%, Voltage Rating=50V, LCSC_Price_1ku=0.0015, Mounting Technology=SM, Pins=2, RoHS Compliant=True
C7 C11 C61 C63 C64 C65: library part CMP-001-00213-1, "Chip Capacitor, 2.2nF, 10%, 50 V, 0603", Case/Package=0603, LCSC_Part_#=C107082, MFR_Part_#=CC0603KRX7R9BB222, Voltage Rating=50V, LCSC_Price_1ku=0.0021
C8 C14 C16: library part CMP-001-00218-2, "Cap Aluminum 10uF 100V 20% (8 X 10.2mm) SMD 85mA 2000 hr 85°C T/R", LCSC_Part_#=C2895755, MFR="Honor Elec", LCSC_Price_1ku=0.0415, MFR_Part_#=RVT2A100M0810
C9 C15: library part CMP-001-00209-2, "Chip Capacitor, 100 nF, +/- 10%, 100 V, 0603 (1608 Metric)", Capacitor Type=Ceramic, Case/Package=0603, LCSC_Part_#=C15725, Max Operating Temperature=125°C, MFR=Samsung, MFR_Part_#=CL10B104KC8NNNC, Min Operating Temperature=-55°C, Tolerance=10%, Voltage Rating=100V, LCSC_Price_1ku=0.0066, Mounting Technology=SM, Pins=2, RoHS Compliant=True
C10 C17: library part CMP-001-00214-2, "Chip Capacitor, 1 uF, X7R 10%, 100 V, 0805", Capacitor Type=Ceramic, Case/Package=0805, LCSC_Part_#=C22367837, MFR_Part_#=HHV0805R7105K101NSLJ, Tolerance=10%, Voltage Rating=100V, LCSC_Price_1ku=0.0246, Pins=2
C12: library part CMP-001-00221-1, "MLCC 22u X7R 25V 10% 1210", Dielectric=X7R, LCSC_Part_#=C309062, Manufacturer=Generic, MFR_Part_#=CL32B226KAJNNNE, PartNumber="22u X7R 16V 10% 1210", Tolerance=10%, Voltage=25V, Component Type=Standard, Design Item ID="2u X7R 25V 10% 1210", LCSC_Price_1ku=0.0679, Pin Count=2, Source=GT_WH_Control.SCHLIB, Status=Preferred
C13: library part CMP-001-00202-2, "Chip Capacitor, 68pF, +/- 10%, 50 V, 0603 (1608 Metric)", Capacitor Type=Ceramic, Case/Package=0603, LCSC_Part_#=C62782, Max Operating Temperature=125°C, MFR_Part_#=CC0603JRNPO9BN680, Min Operating Temperature=-55°C, Tolerance=10%, Voltage Rating=50V, LCSC_Price_1ku=0.0019, Mounting Technology=SM, Pins=2, RoHS Compliant=True
C19 C24: library part CMP-001-00223-1, "Condensateurs à film FKP 2 1000 pF 1000 VDC 6.5x8x7.2 PCM 5", MFR_Part_#=FKP2O111001I00HC00
C20 C25: library part CMP-001-00224-1, "Condensateurs à film 220 pF 100 VDC 2.5%", MFR_Part_#=FKP2O111001I00HC00
C22: library part CMP-001-00225-1, "Condensateurs à film 470 pF 250 VDC 2.5%", MFR_Part_#=FKP2F004701D00HA00
C23: library part CMP-001-00226-1, "Condensateurs à film 2200pF 100 Volt 2.5%", MFR_Part_#=FKP2D012201D00HC00
C34: library part CMP-001-00077-4, "Chip Capacitor, 470nF +/-20%, 25V, 0603, Thickness 1 mm", Case/Package=0603, Max Operating Temperature=85°C, Min Operating Temperature=-55°C, Tolerance=10%, Voltage Rating=25V, Mounting Technology=SMT, Pins=2
C35 C37 C47 C55 C57 C62 C66 C69: library part CMP-001-00201-1, "Chip Capacitor, 4.7uF, +/- 10%, 16V, 0603 (1608 Metric)", Capacitor Type=Ceramic, Case/Package=0603, LCSC_Part_#=C19666, Max Operating Temperature=125°C, MFR_Part_#=CL10A475KO8NNNC, Min Operating Temperature=-55°C, Tolerance=10%, Voltage Rating=16V, LCSC_Price_1ku=0.0063, Mounting Technology=SM, Pins=2, RoHS Compliant=True
C36 C68: library part CMP-001-00203-2, "Chip Capacitor, 1 nF, 10%, 50 V, 0603 (1608 Metric)", Capacitor Type=Ceramic, Case/Package=0603, LCSC_Part_#=C1588, Max Operating Temperature=125°C, MFR_Part_#=CL10B102KB8NNNC, Min Operating Temperature=-55°C, Tolerance=10%, Voltage Rating=50V, LCSC_Price_1ku=0.0020, Mounting Technology=SM, Pins=2, RoHS Compliant=True
C38: library part CMP-001-00216-2, "MLCC 22n X7R 100V 10% 0603", Dielectric=X7R, LCSC_Part_#=C313105, Manufacturer=Generic, MFR_Part_#=CC0603KRX7R0BB223, Tolerance=10%, Voltage=100V, Component Type=Standard, Design Item ID="22n X7R 100V 10% 0603", LCSC_Price_1ku=0.0071, PartNumber="22n X7R 100V 10% 0603", Pin Count=2, Source=GT_WH_Control.SCHLIB, Status=Preferred
C39 C40: library part CMP-001-00207-2, "Chip Capacitor, 22pF, 10%, 16V, 0603 (1608 Metric)", Capacitor Type=Ceramic, Case/Package=0603, LCSC_Part_#=C561800, Max Operating Temperature=125°C, MFR_Part_#=C0603C220J4GAC7867, Min Operating Temperature=-55°C, Tolerance=10%, Voltage Rating=16V, LCSC_Price_1ku=0.0209, Mounting Technology=SM, Pins=2, RoHS Compliant=True
C43 C44 C70 C71 C72: library part CMP-001-00194-3, "Chip Capacitor, 10 nF, +/- 10%, 50 V, 0603 (1608 Metric)", Capacitor Type=Ceramic, Case/Package=0603, LCSC_Part_#=C57112, Max Operating Temperature=125°C, MFR_Part_#=0603B103K500NT, Min Operating Temperature=-55°C, Tolerance=10%, Voltage Rating=50V, LCSC_Price_1ku=0.0015, Mounting Technology=SM, Pins=2, RoHS Compliant=True
C45 C46: library part CMP-001-00200-2, "Chip Capacitor, 20 pF, +/- 5%, 16V, 0603 (1608 Metric)", Capacitor Type=Ceramic, Case/Package=0603, LCSC_Part_#=C2190570, MFR_Part_#=CC0603JRNPO7BN200, Min Operating Temperature=-55°C, Tolerance=5%, Voltage Rating=16V, LCSC_Price_1ku=0.0022, Mounting Technology=SM, Pins=2, RoHS Compliant=True
CN1: library part CMP-002-00065-4, "USB-C Connector, 20 V, 1.25 A, -30 to 80 degC, RoHS, Tape and Reel", Connector Type=USB-C, Gender=Receptacle, Pins=28
D1 D2 D3 D4 D5 D7: library part CMP-007-00044-3, "0603 Green LED", LCSC_Part_#=C12624, LCSC_Price_1ku=0.0068, MFR_Part_#=KT-0603G
D6: library part CMP-004-00073-2, "Schottky Diode, 2A, 100V, Smb", LCSC_Part_#=C14996, LCSC_Price_1ku=0.0124, MFR_Part_#=SS210
J1: library part CMP-002-00121-1, "2.54mm Single Row 3A 4P Bronze -40℃~+105℃ Direct Insert 1x4P Top Square Hole Plugin,P=2.54mm Female Headers ROHS", LCSC_Part_#=C2718488, MFR="BOOMELE(Boom Precision Elec)", LCSC_Price_1ku=0.026, MFR_Part_#=2.54-1*4P
J3: library part CMP-002-00092-2, "Copper Alloy 1x2P Tin 6.35mm 4 1 2 -40℃~+105℃ 30A 300V Green 10~26 Straight Plugin,P=6.35mm Screw terminal ROHS", LCSC_Part_#=C5188489, LCSC_Price_1ku=0.1045, MFR_Part_#=MX635-6.35-02P-GN01-Cu-PS-A
J4 J6: library part CMP-543-000000-2, "1 Inner Hole SMA Board-End Staggered pins 50Ω 5.2mm SMD Coaxial Connectors (RF) ROHS", LCSC_Part_#=C496550, MFR="BAT WIRELESS", LCSC_Price_1lu=0.2065, MFR_Part_#=BWSMA-KE-P001
J5: library part CMP-545-000000-2, "3.5 mm, Stereo, Right Angle, Through Hole, 3 Conductors, 0 Internal Switches, Audio Jack Connector", LCSC_Part_#=C20182914, MFR=CUI, LCSC_Price_1ku=0.6476, MFR_Part_#=SJ1-3523N
K1: library part CMP-499-000000-2, "5V Trigger Relay Module For Arduino And Raspberry Pi 5V Trigger Relay Module For Arduino And Raspberry Pi", LCSC_Part_#=C35449, LCSC_Price_1ku=0.18, MFR_Part_#=SRD-05VDC-SL-C
L1: library part CMP-006-00046-1, "2.1A 68uH Shielded inductor ±20% 4A SMD,12.3x12.3mm Power Inductors ROHS", LCSC_Part_#=C9907, LCSC_Price_1ku=0.0993, MFR_Part_#=SMDRI127-680MT
L2: library part CMP-006-00043-1, "4.5A 10uH Molding Choke ±20% 5.5A SMD,6.6x7mm Power Inductors ROHS", LCSC_Part_#=C167223, LCSC_Price_1ku=0.0934, MFR_Part_#=FXL0630-100-M
L3: library part CMP-006-00050-1, "Inductances de puissance - CMS Ind,5.2x5.2x2.8,10uH+/-20%,2.3A,shd", MFR=Bourns, MFR_Part_#=SRR5228A-100M
L4: library part CMP-006-00052-1, "Inductor Power Chip Unshielded Wirewound 120nH 20% 1MHz Ferrite 6A 9.8mOhm DCR 2220 T/R", LCSC_Part_#=C711154, MFR=Murata, LCSC_Price_1ku=0.2902, MFR_Part_#=LQH55DNR12M03L
L5: library part CMP-006-00051-1, "Inductor, 146Nh, 332Mhz, 19A, 20% Rohs Compliant: Yes", MFR="Wurth Elektronik", MFR_Part_#=7449150146
Q1: library part CMP-013-00050-1, "100-V, N channel NexFET™ power MOSFET, single SON 2 mm x 2 mm, 59 mOhm 6-WSON -55 to 150", LCSC_Part_#=C2838636, LCSC_Price_1ku=0.3656, MFR_Part_#=CSD19538Q2
Q2: library part CMP-013-00042-1, "Mosfet N-ch 60V 300MA SOT23 / Trans Mosfet N-ch 60V 0.3A 3-PIN SOT-23 T/r", LCSC_Part_#=C5247922, LCSC_Price_1ku=0.00119, MFR_Part_#=2N7002K
R1 R8 R10 R15 R16 R18 R20: library part CMP-009-00312-2, "Standard Resistor 1K 1% 0.1W 0603", LCSC_Part_#=C21190, Manufacturer=Generic, MFR_Part_#=0603WAF1001T5E, PartNumber="1K 1% 0.1W 0603", Power=0.1W, Tolerance=1%, Component Type=Standard, Design Item ID="1K 1% 0.1W 0603", LCSC_Price_1ku=0.0007, Pin Count=2, Source=GT_WH_Control.SCHLIB, TC=200
R2: library part CMP-356-000043-3, "Standard Resistor 10K 1% 0.1W 0603", LCSC_Part_#=C25804, Manufacturer=Generic, MFR_Part_#=0603WAF1002T5E, PartNumber="10K 1% 0.1W 0603", Power=0.1W, Tolerance=1%, Component Type=Standard, Design Item ID="10K 1% 0.1W 0603", LCSC_Price_1ku=0.0007, Pin Count=2, Source=GT_WH_Control.SCHLIB, TC=200
R3 R5: library part CMP-009-00334-2, "Standard Resistor 681K 1% 0.1W 0603", LCSC_Part_#=C23229, Manufacturer=Generic, MFR_Part_#=0603WAF6813T5E, PartNumber="681K 1% 0.1W 0603", Component Type=Standard, Design Item ID="681K 1% 0.1W 0603", LCSC_Price_1ku=0.0007
R4: library part CMP-356-000002-4, "Standard Resistor 0R 1% 0.1W 0603", LCSC_Part_#=C21189, Manufacturer=Generic, MFR_Part_#=0603WAF0000T5E, PartNumber="0R1 1% 0.1W 0603", Power=0.1W, Tolerance=1%, Component Type=Standard, Design Item ID="0R 1% 0.1W 0603", LCSC_Price_1ku=0.0006, Pin Count=2, Source=GT_WH_Control.SCHLIB, TC=200
R6: library part CMP-009-00306-3, "Standard Resistor 100K 1% 0.1W 0603", LCSC_Part_#=C25803, Manufacturer=Generic, MFR_Part_#=0603WAF1003T5E, PartNumber="100K 1% 0.1W 0603", Power=0.1W, Tolerance=1%, Component Type=Standard, Design Item ID="100K 1% 0.1W 0603", LCSC_Price_1ku=0.0007, Pin Count=2, Source=GT_WH_Control.SCHLIB, TC=200
R7: library part CMP-009-00347-1, "Standard Resistor 215K 1% 0.1W 0603", LCSC_Part_#=C5713280, Manufacturer=Generic, MFR_Part_#=FRC0603F2153TS, Component Type=Standard, Design Item ID="215K 1% 0.1W 0603", LCSC_Price_1ku=0.0007, PartNumber="215K 1% 0.1W 0603"
R9: library part CMP-009-00307-3, "Standard Resistor 10R 1% 0.1W 0603", LCSC_Part_#=C22859, Manufacturer=Generic, MFR_Part_#=0603WAF100JT5E, Power=0.1W, Tolerance=1%, Component Type=Standard, Design Item ID="100R 1% 0.1W 0603", LCSC_Price_1ku=0.0007, PartNumber="10R 1% 0.1W 0603", Pin Count=2, Source=GT_WH_Control.SCHLIB, TC=200
R11 R22: library part CMP-009-00348-1, "Standard Resistor 27R 1% 0.1W 0603", LCSC_Part_#=C25224, Manufacturer=Generic, MFR_Part_#=0603WAJ0270T5E, Power=0.1W, Tolerance=1%, Component Type=Standard, Design Item ID="27R 1% 0.1W 0603", LCSC_Price_1ku=0.0007, PartNumber="27R 1% 0.1W 0603", Pin Count=2, Source=GT_WH_Control.SCHLIB, TC=200
R12 R13 R23 R26 R29 R30 R31 R32 R33: library part CMP-356-000043-3, "Standard Resistor 10K 1% 0.1W 0603", LCSC_Part_#=C25804, Manufacturer=Generic, MFR_Part_#=0603WAF1002T5E, Power=0.1W, Tolerance=1%, Component Type=Standard, Design Item ID="10K 1% 0.1W 0603", LCSC_Price_1ku=0.0007, PartNumber="10K 1% 0.1W 0603", Pin Count=2, Source=GT_WH_Control.SCHLIB, TC=200
R14 R21: library part CMP-009-00322-2, "Standard Resistor 5.1K 1% 0.1W 0603", LCSC_Part_#=C23186, Manufacturer=Generic, MFR_Part_#=0603WAF5101T5E, Power=0.1W, Tolerance=1%, Component Type=Standard, Design Item ID="5.1K 1% 0.1W 0603", LCSC_Price_1ku=0.0007, PartNumber="5.1K 1% 0.1W 0603", Pin Count=2, Source=GT_WH_Control.SCHLIB, TC=200
R17 R27 R28: library part CMP-009-00329-2, "Standard Resistor 2K 1% 0.1W 0603", LCSC_Part_#=C22975, Manufacturer=Generic, MFR_Part_#=0603WAF2001T5E, Power=0.1W, Tolerance=1%, Component Type=Standard, Design Item ID="2K 1% 0.1W 0603", LCSC_Price_1ku=0.0007, PartNumber="2K 1% 0.1W 0603", Pin Count=2, Source=GT_WH_Control.SCHLIB, TC=200
R19: library part CMP-009-00305-3, "Standard Resistor 100R 1% 0.1W 0603", LCSC_Part_#=C22775, Manufacturer=Generic, MFR_Part_#=0603WAF1000T5E, Power=0.1W, Tolerance=1%, Component Type=Standard, Design Item ID="100R 1% 0.1W 0603", LCSC_Price_1ku=0.0008, PartNumber="100R 1% 0.1W 0603", Pin Count=2, Source=GT_WH_Control.SCHLIB, TC=200
R24 R25: library part CMP-009-00008-5, "Chip Resistor, 0 Ohm, 0.25 W, -55 to 155 degC, 1206 (3216 Metric)", Case/Package=1206, Max Operating Temperature=155°C, Min Operating Temperature=-55°C, Power=250mW, Tolerance=0.05%, Voltage Rating=200V, Mounting Technology=SM, Pins=2, RoHS Compliant=True
SW1 SW2 SW3 SW4 SW5: library part CMP-479-000000-4, "Tactile Switches 500mOhm 2.55N 16VDC 4.2X3.2X2.5MM 50mA", LCSC_Part_#=C470427, Manufacturer_Name="ALPS Electric", Mouser Part Number=688-SKRPASE010, Datasheet Link=https://www.mouser.ca/ProductDetail/ALPS/SKRPASE010?qs=byeeYqUIh0NdKk8WD590Nw%3D%3D, Design Item ID=SKRPASE010, Geometry.Height=2.5mm, LCSC_Price_1ku=0.0694, Manufacturer_Part_Number=SKRPASE010, MFR_Part_#=SKRPASE010, Mouser Price/Stock=https://www.mouser.co.uk/ProductDetail/Alps-Alpine/SKRPASE010?qs=byeeYqUIh0NdKk8WD590Nw%3D%3D, Source=SKRPASE010.SchLib
TP1 TP2 TP3 TP4 TP5 TP6 TP7 TP8 TP9 TP10 TP11 TP12 TP13: library part CMP-001-0002-2, "60mils touchpoint"
U1 U6 U7: library part CMP-019-00060-1, "IC REG LDO 3.3V 0.3A SOT23-5", LCSC_Part_#=C156285, MFR="Diodes Incorporated", LCSC_Price_1ku=0.0388, MFR_Part_#=AP2127K-3.3TRG1
U2: library part CMP-003-00032-1, "IC CLK GENERATOR 160MHZ 10MSOP", LCSC_Part_#=C504891, MFR_Part_#="SKYWORKS/SILICON LABS", LCSC_Price_1ku=0.5946, MFR=SI5351A-B-GTR
U3: library part CMP-023-00001-2, "Three-Wire Serial Interface SOP-8 Real Time Clocks ROHS", LCSC_Part_#=C2900599, MFR=JSMSEMI, LCSC_Price_1ku=0.1005, MFR_Part_#=DS1302Z
U4: library part CMP-019-00058-2, "6-V to 100-V input, 1-A synchronous buck DC-DC converter with ultra-low IQ 8-SO PowerPAD -40 to 150", LCSC_Part_#=C477928, LCSC_Price_1ku=0.3281, MFR_Part_#=LM5164DDAR
U5: library part CMP-015-00016-1, "4-A/4-A single-channel gate driver with 5-V UVLO, enable, and CMOS input 5-SOT-23 -40 to 140", LCSC_Part_#=C2676969, MFR="Texas Instruments", LCSC_Price_1ku=0.5183, MFR_Part_#=UCC27519DBVT
U8: library part CMP-021-00008-1, "RF Receiver AM/FM/LW/SW 3.3V/5V Automotive 24-Pin SSOP Tube", LCSC_Part_#=C1526089, MFR="SKYWORKS/SILICON LABS", LCSC_Price_1ku=8.7411, MFR_Part_#=SI4735-D60-GU
U9: library part CMP-547-000000-2, "133MHz LQFN-56(7x7) Microcontrollers (MCU/MPU/SOC) ROHS ARM® Cortex®-M0+ MCU 32-Bit", LCSC_Part_#=C2040, MFR="Raspberry Pi", LCSC_Price_1ku=0.6733, MFR_Part_#=RP2040
U10: library part CMP-019-00061-1, "16Mb Serial NOR Flash 133MHz USON8", LCSC_Part_#=C2843335, MFR="Winbond Elec", LCSC_Price_1ku=0.2127, MFR_Part_#=W25Q16JVUXIQ
U11: library part CMP-016-00014-1, "2 Circuit IC Switch 4:1 75 Ohm 16-TSSOP", LCSC_Part_#=C8142, MFR="Texas Instruments", LCSC_Price_1ku=0.0974, MFR_Part_#=SN74LV4052APWR
U12: library part CMP-014-00007-1, "MCP6002 Series 6 V 1 MHz SMT Low-Power Operational Amplifier - SOIC-8", LCSC_Part_#=C116706, MFR="Microchip Tech", LCSC_Price_1ku=0.238, MFR_Part_#=MCP6002-I/SN
Y1: library part CMP-003-00033-1, "25MHz Surface Mount Crystal 8pF ±10ppm ±20ppm SMD5032 Crystals ROHS", LCSC_Part_#=C19711738, Manufacturer=YXC, LCSC_Price_1ku=0.1118, MFR_Part_#=XG1EL89CKI-111YLC-25M
Y2 Y3: library part CMP-003-00034-2, "32.768kHz Surface Mount Crystal 6pF ±20ppm SMD3215-2P Crystals ROHS", LCSC_Part_#=C95361, MFR="Seiko Epson", LCSC_Price_1ku=0.1269, MFR_Part_#=Q13FC13500049
Y4: library part CMP-003-00035-1, "12MHz Surface Mount Crystal 20pF ±10ppm ±20ppm SMD5032 Crystals ROHS", LCSC_Part_#=C112573, Manufacturer=YXC, LCSC_Price_1ku=0.1205, MFR_Part_#=X503212MSB2GI

## Free pads (board coordinates)
  round 2 hole 1.5: 8(48,98)

## Via types
v1: diameter 0.6, hole 0.3, Top Layer to Bottom Layer, tented both sides, 171 vias

## Nets (pads, with @x,y where several pads share a name; then routed paths per layer and width w, separated by ;. In a path a pad name is that pad's centre, name@x,y a point inside that pad or via, vN(x,y) a via of type N, cw(c..) or ccw(c..) an arc to the next point about the centre after c; other vN are vias at no path point)
1V1: C57.2 C58.2 C59.2 C60.2 U9.23 U9.45 U9.50 | length 70.5
  Top Layer w0.2: U9.50@27.178,28.185 27.178,30.072 27.603,30.497 27.603,31.017 C60.2@27.978,31.392 ; U9.23@27.978,21.315 27.978,20.008 29.341,18.645 30.896,18.645 C57.2@33.366,16.175 C59.2@35.141,16.175 ; U9.45@29.178,28.185 29.178,29.441 29.911,30.175 30.875,30.175 v1(30.878,30.178) 30.878,31.05 C58.2@31.222,31.394
  Top Layer w0.4: v1(26.684,31.392) C60.2@27.978,31.392 ; C59.2@35.141,16.175 35.146,16.171 36.423,16.171 v1(36.427,16.166)
  Bottom Layer w0.4: v1(30.878,30.178) 29.663,31.392 v1(26.684,31.392) 22.394,31.392 17.973,26.971 17.973,15.153 22.576,10.55 30.811,10.55 v1(36.427,16.166)